# Altium PCB IMX8MMLPD4-CPU2_FULLY_PREPLACED_FANOUT.PcbDoc (part 1 of 3)
Units mil, origin at the board's own origin, x right, y up, seen from the top; angles counter-clockwise.
Board outline 2729.93 x 2000.03 mil, 8 copper layers (L1_PS, L2_GND_1, L3_IN1, L4_GND_2, L5_PWR_1, L6_PWR_2, L7_GND_3, L8_SS), stack 46.1 mil thick; 228 components, 321 nets, 1593 pads, 372 vias.
Unrouted connection lines stored in the file: 857.
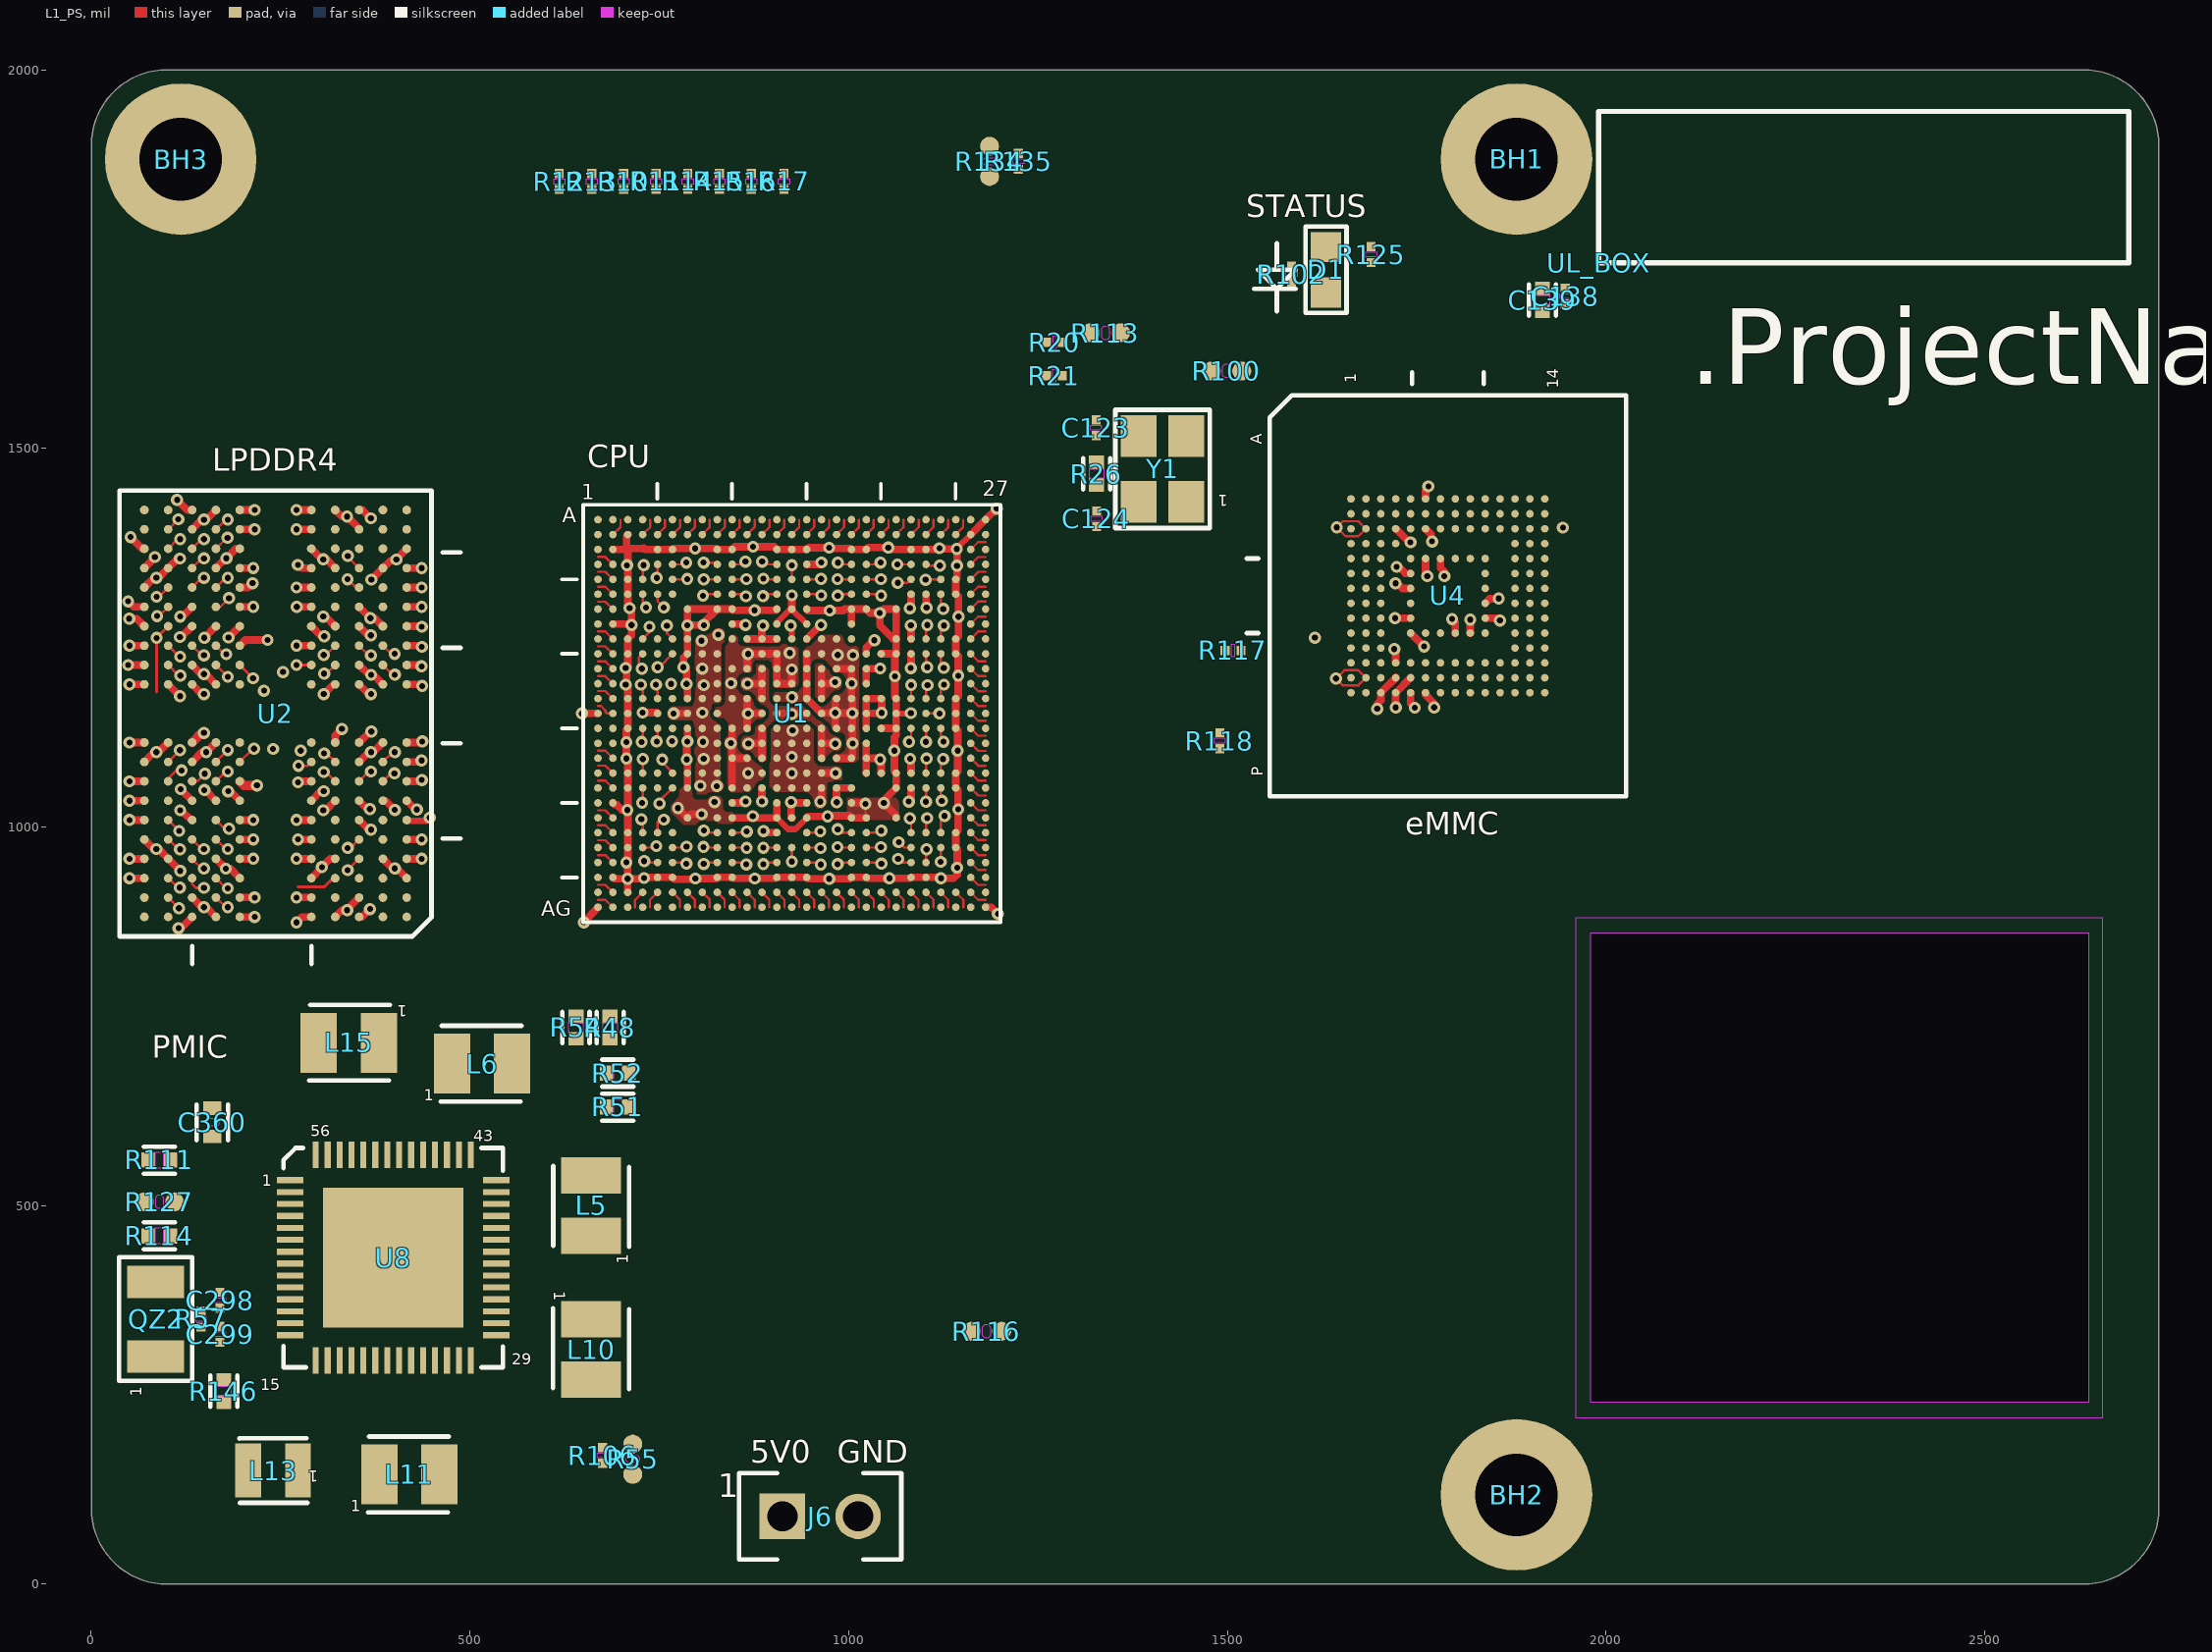
[diagram p0: L1_PS view]
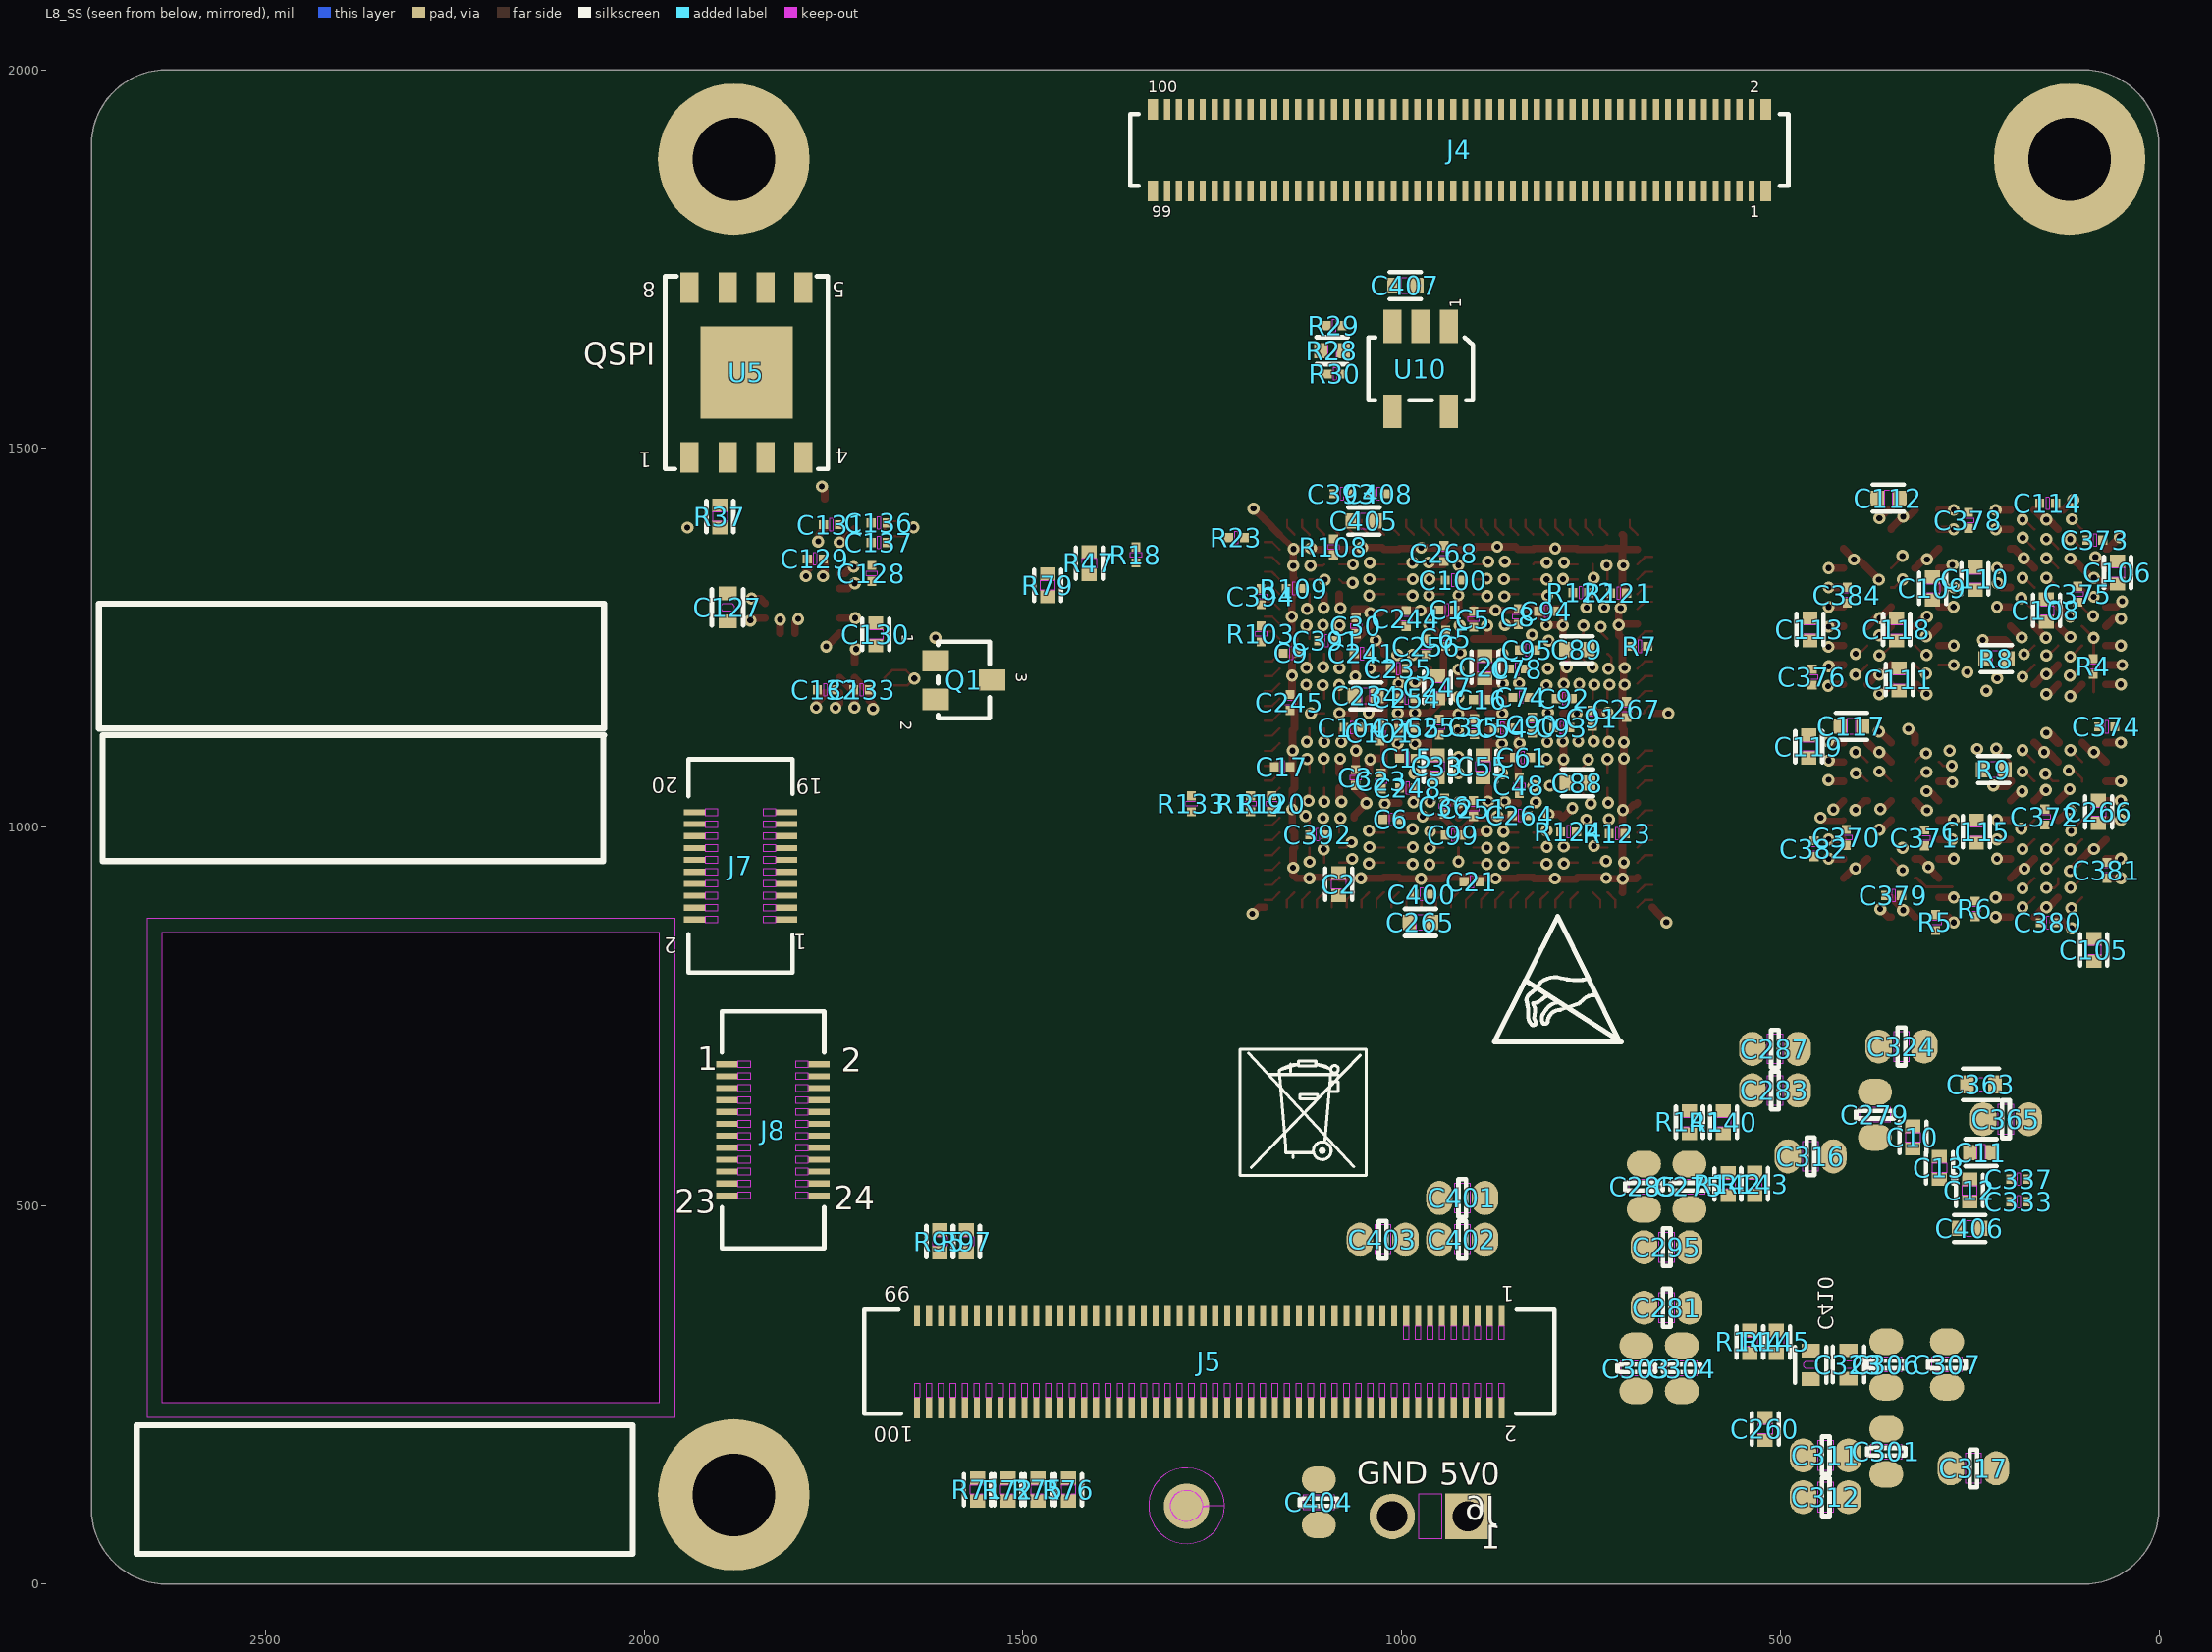
[diagram p1: L8_SS view, seen from below]
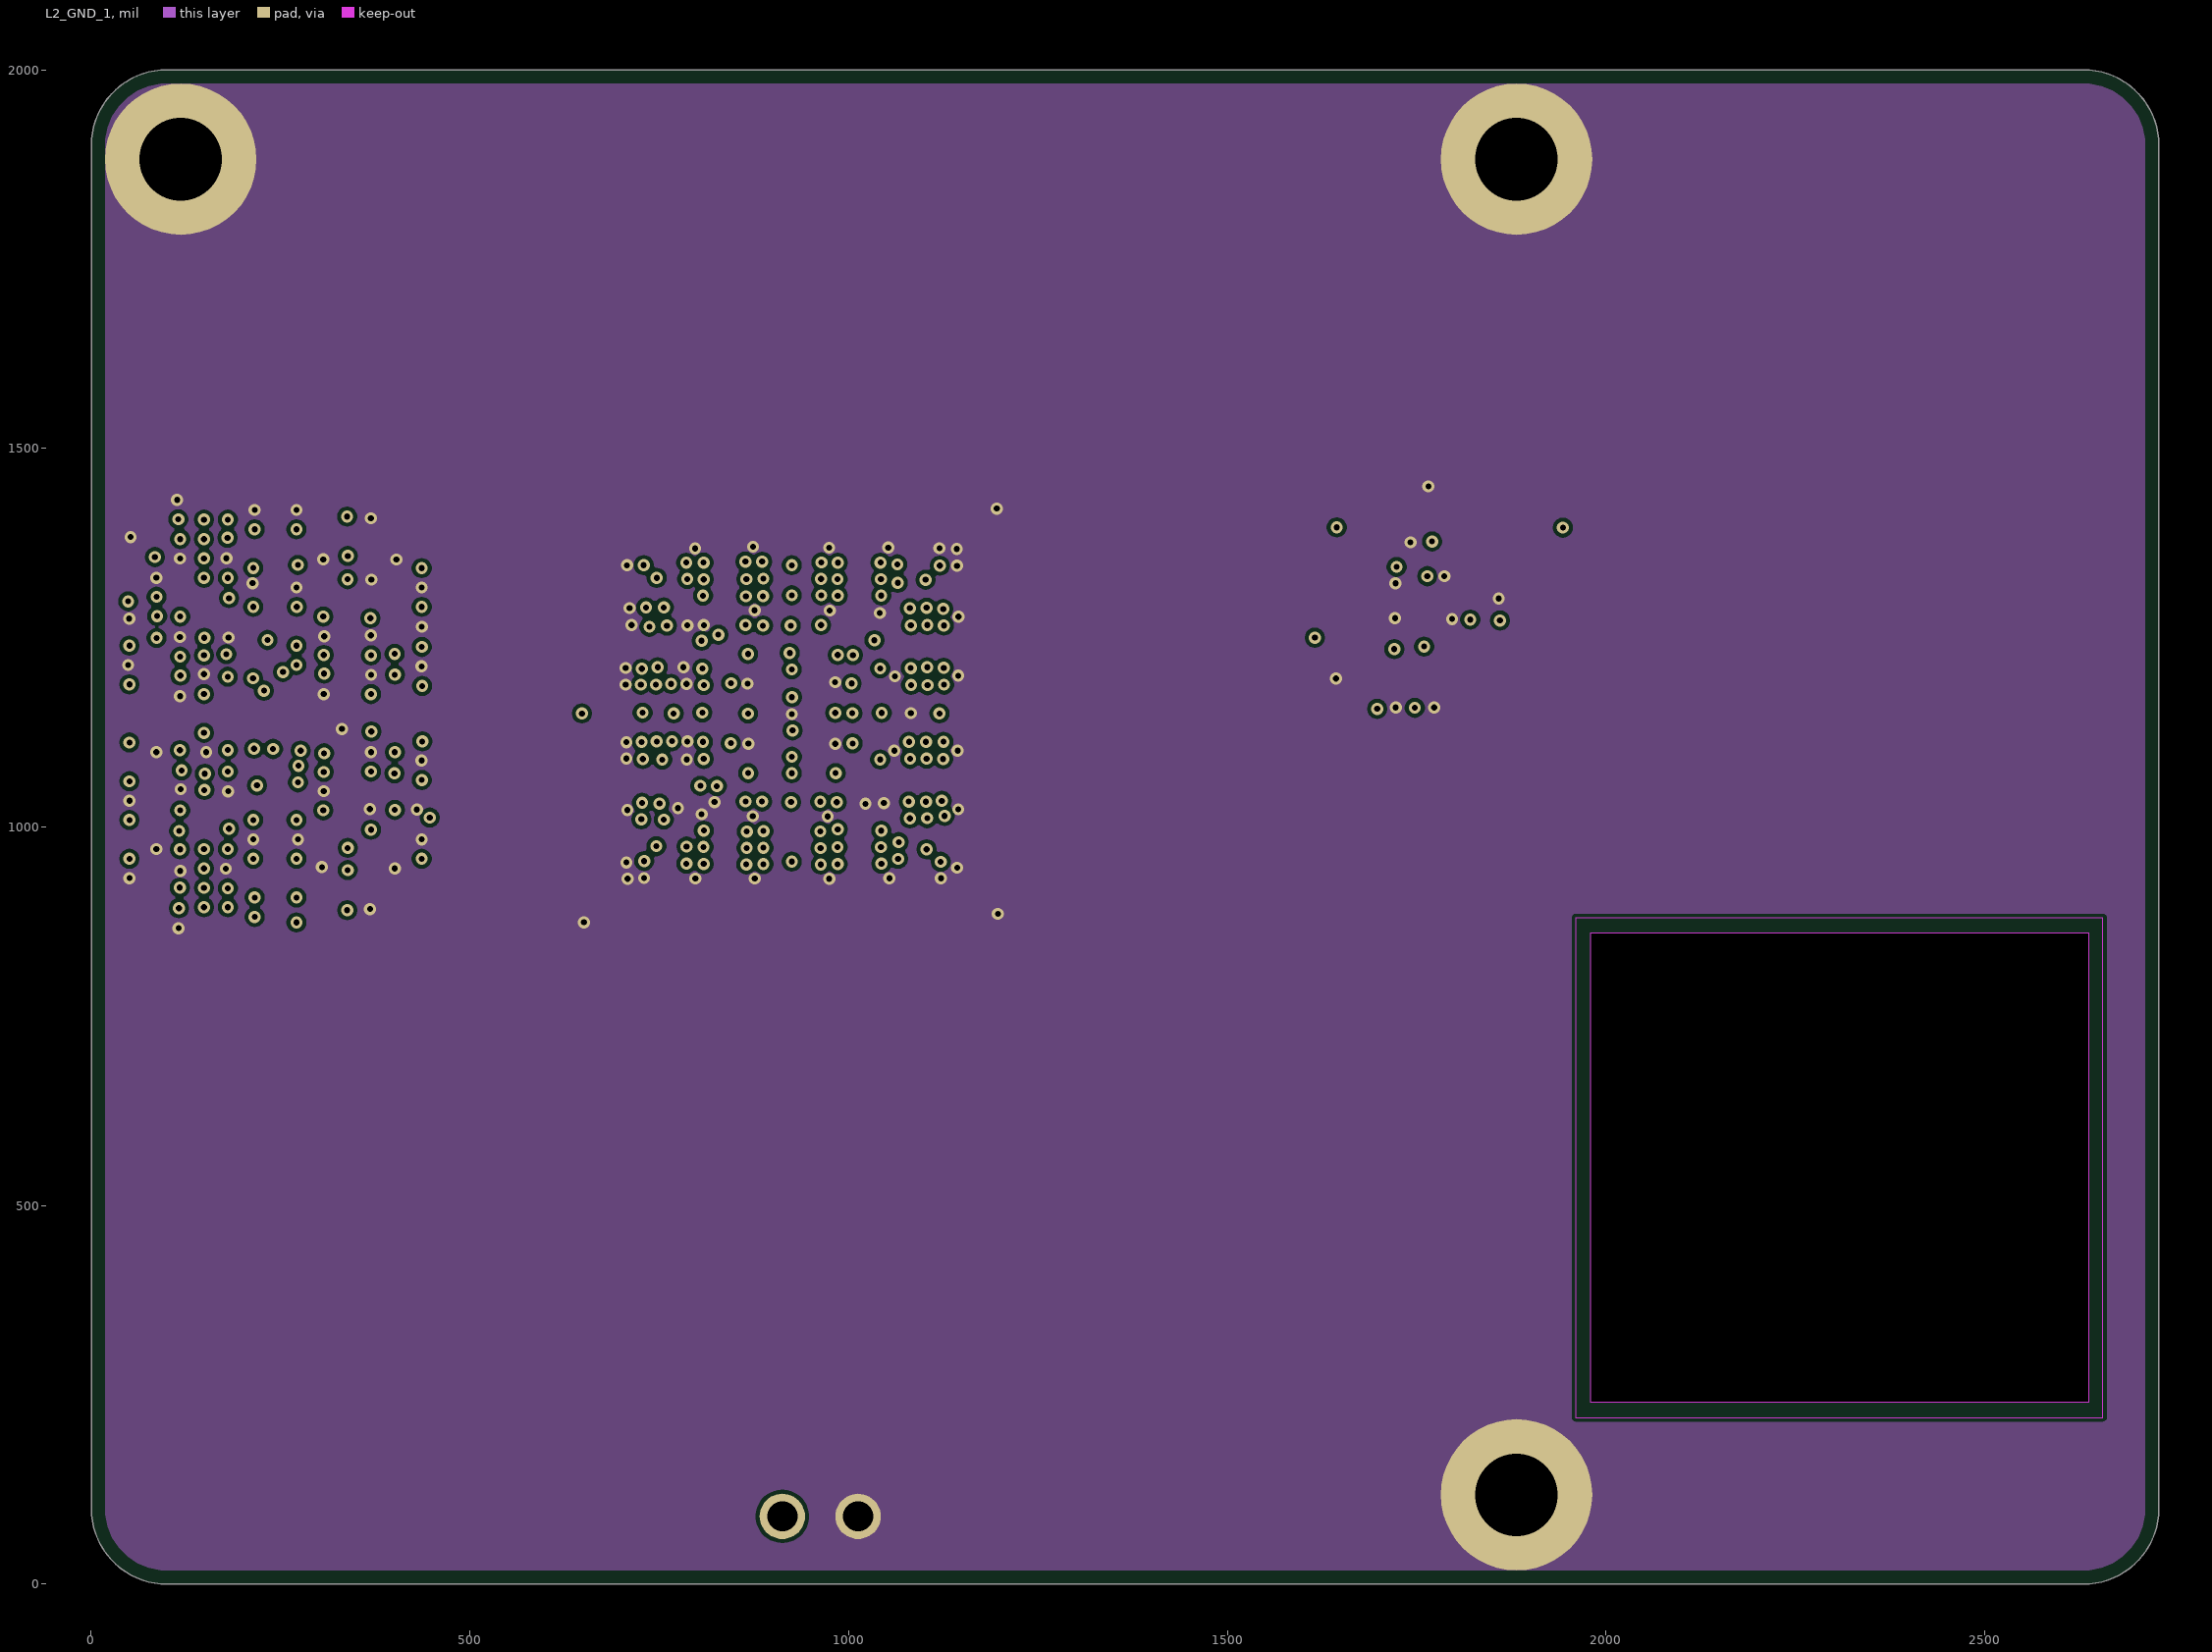
[diagram p2: L2_GND_1]
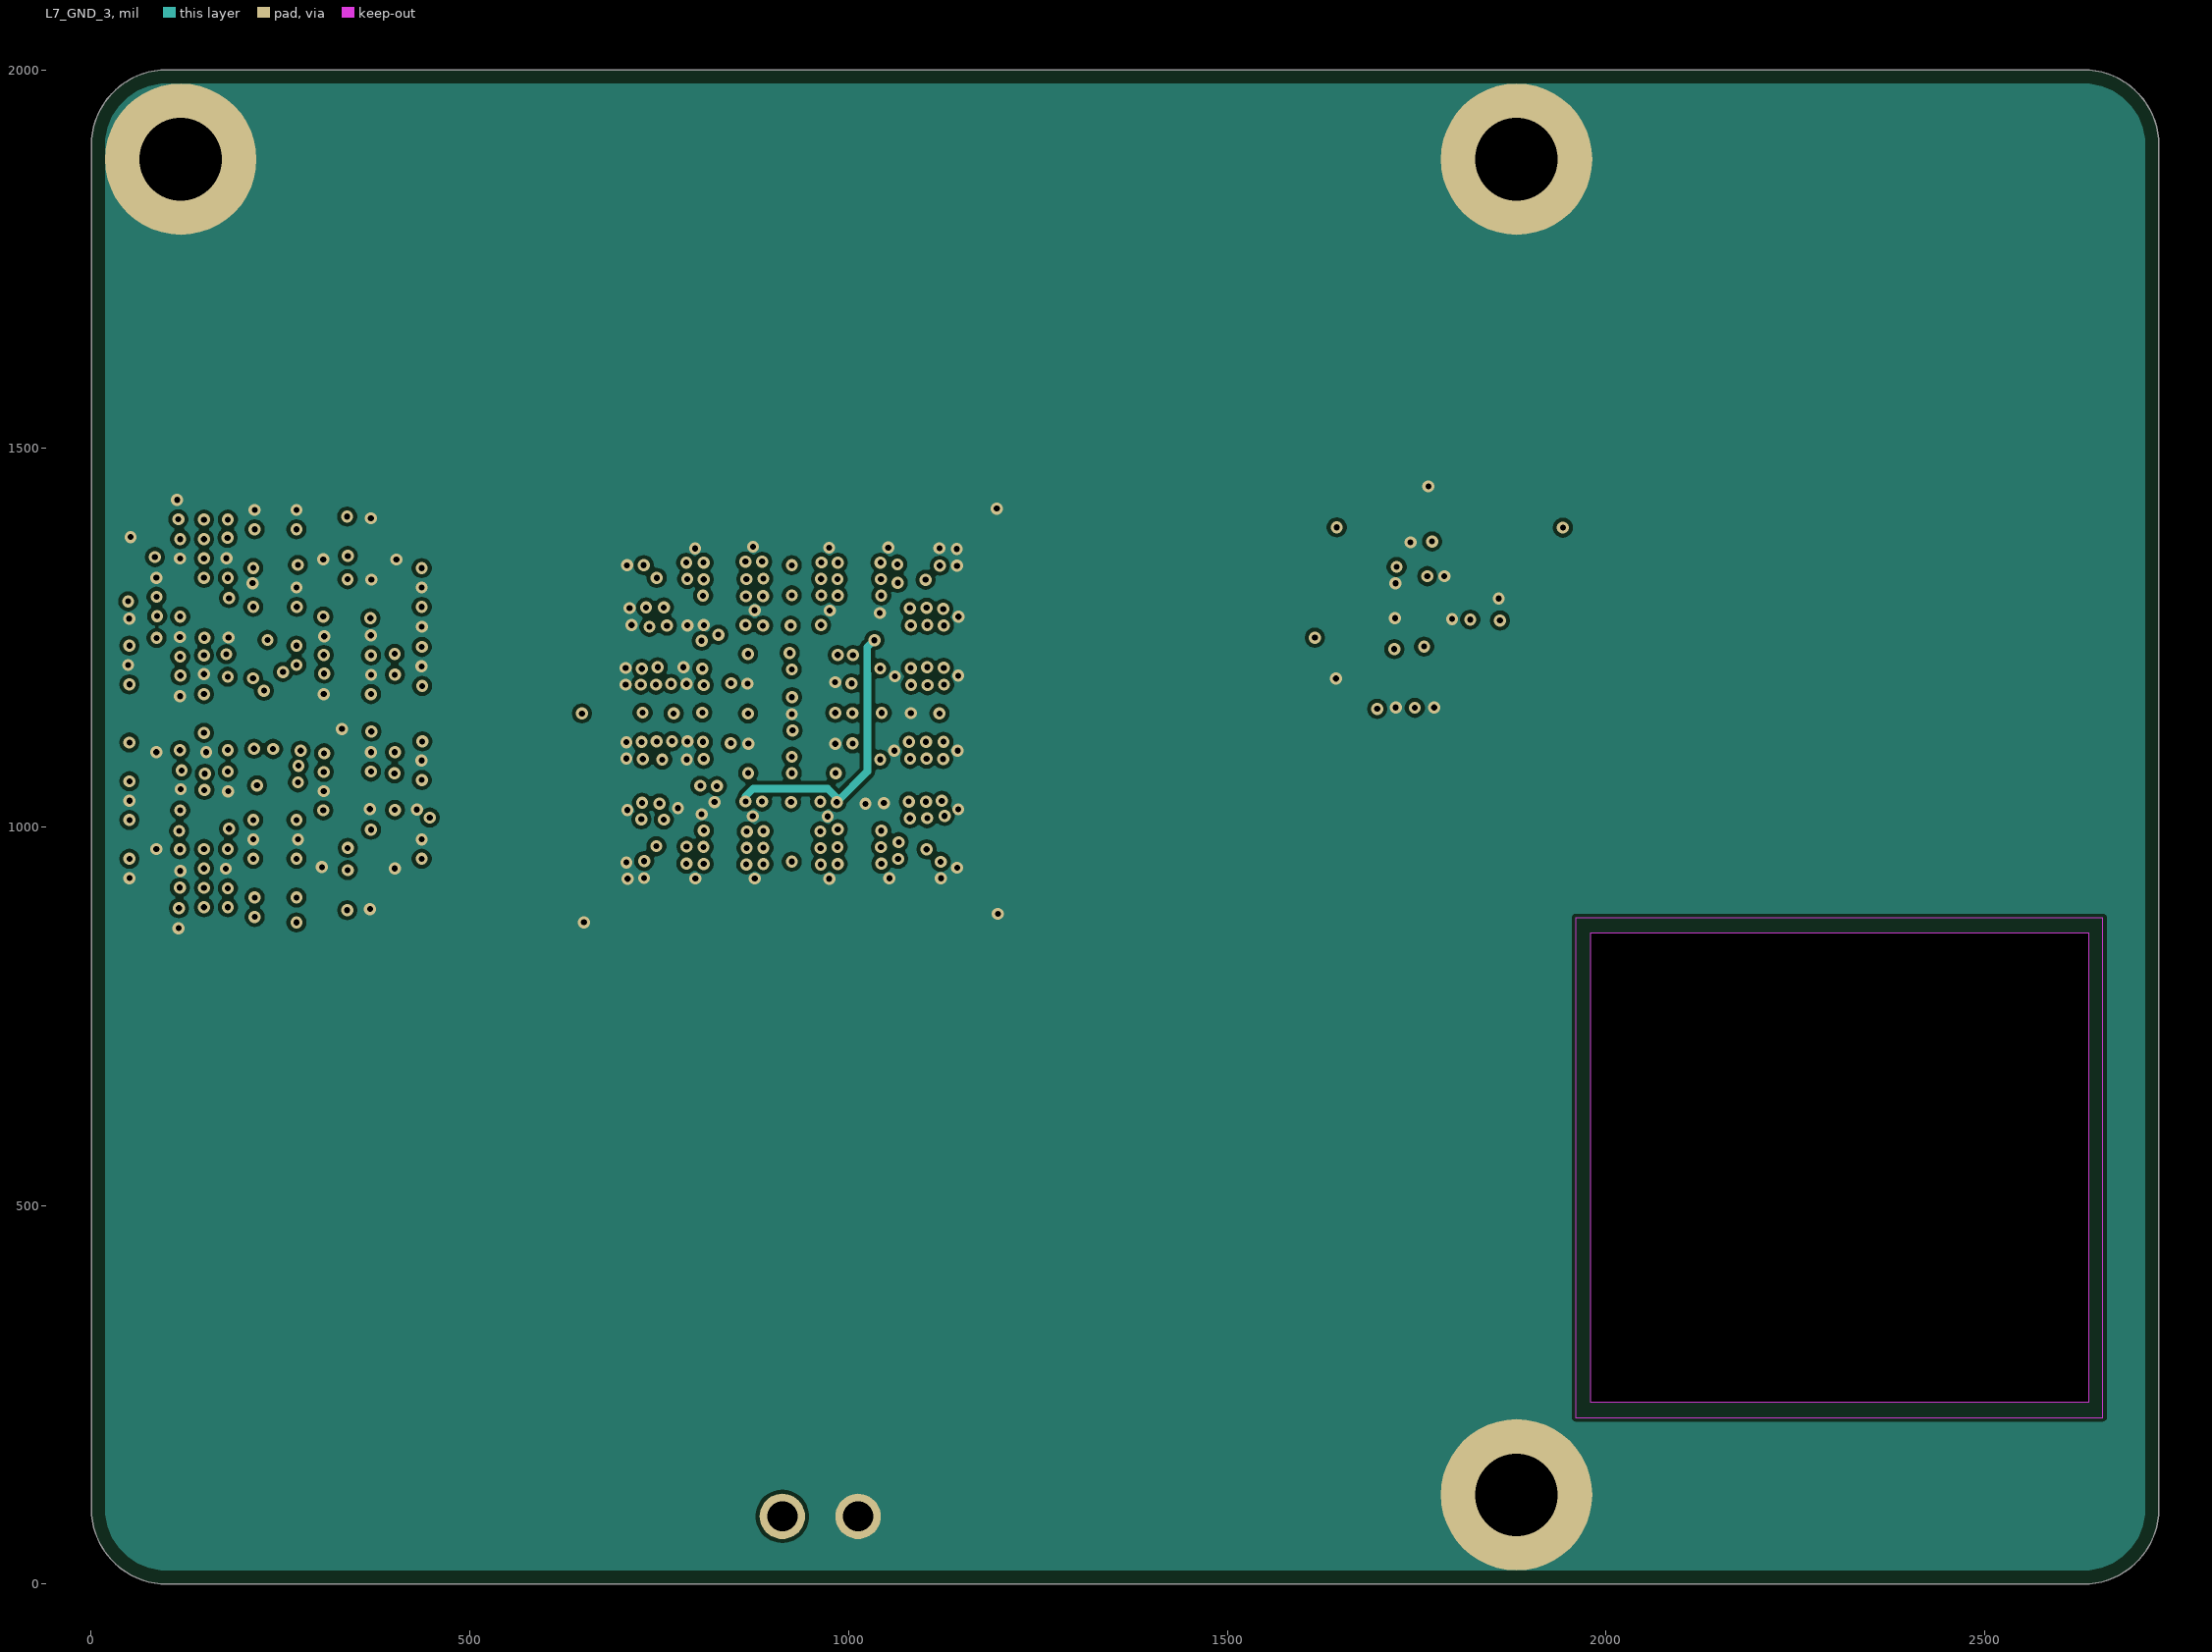
[diagram p3: L7_GND_3]

## Layer stack, top to bottom
Top Solder: solder mask 0.4, Solder Resist, Dk 3.5
L1_PS: signal copper 1.7
Dielectric 1: prepreg 2.77, TU768, Dk 3.9
L2_GND_1: signal copper 1.2
Dielectric2: core 3.94, TU768, Dk 4.25
L3_IN1: signal copper 1.2
Dielectric3: prepreg 5.04, TU768, Dk 3.9
L4_GND_2: signal copper 1.2
Dielectric4: core 12, TU768, Dk 4.25
L5_PWR_1: signal copper 1.2
Dielectric 5: prepreg 5.04, TU768, Dk 3.9
L6_PWR_2: signal copper 1.2
Dielectric 6: core 3.94, TU768, Dk 4.25
L7_GND_3: signal copper 1.2
Dielectric 7: prepreg 2.77, TU768, Dk 3.9
L8_SS: signal copper 1.7
Board Layer Stack Bottom Solder: solder mask 0.4, Solder Resist, Dk 3.5

## Board outline
1799.96,0.03 100.07,0.03 cw(c100.07,100.03) 0.07,100.03 0.07,1900.03 cw(c100.07,1900.03) 100.07,2000.03 1900,2000.03 2600,2000.03 2630,2000.03 cw(c2630,1900.03) 2730,1900.03 2730,100 cw(c2630,100) 2630,0 2600,0 1800.03,0 ccw(c1760.61,-91.89)
cut-out: 1980,240 1980,860 2636.98,860 2636.98,240

## Design rules (kind name [scope] priority, off if disabled: settings)
BoardOutlineClearance [All] p1: gap=10 ignorepadtopadclearanceinfootprint=FALSE except(0: Arc-SplitContinuation Track-SplitContinuation SMDPad-SplitContinuation THPad-SplitContinuation Via-SplitContinuation Fill-SplitContinuation Poly-SplitContinuation Region-SplitContinuation Text-SplitContinuation; 18: Poly-OutlineEdge)
Clearance Fanout_Top [WithinRoom('Page05 LPDDR4')] p1: gap=3 ignorepadtopadclearanceinfootprint=FALSE except(4: SMDPad-Fill SMDPad-Poly SMDPad-Region THPad-Fill THPad-Poly THPad-Region Via-Fill Via-Poly Via-Region Fill-Fill Fill-Poly Fill-Region Poly-Poly Poly-Region Region-Region)
Clearance [All] p2: gap=3 ignorepadtopadclearanceinfootprint=FALSE except(5: Arc-Fill Arc-Poly Arc-Region Track-Fill Track-Poly Track-Region SMDPad-Fill SMDPad-Poly SMDPad-Region THPad-Fill THPad-Poly THPad-Region Via-Fill Via-Poly Via-Region Fill-Fill Fill-Poly Fill-Region Poly-Poly Poly-Region Region-Region)
DiffPairsRouting 85OHM_BGA [WithinRoom('Page05 LPDDR4') and (InDifferentialPairClass('PCIE') or InDifferentialPairClass('DDR_CK_DQS'))] p1: maxlimit=10 minlimit=3 mostfreqgap=10 toplayer_maxgap=3 toplayer_prefgap=3 toplayer_minwidth=3 toplayer_maxwidth=3 toplayer_prefwidth=3 midlayer1_minwidth=15 midlayer1_maxwidth=15 midlayer1_prefwidth=15 midlayer2_minwidth=15 midlayer2_maxwidth=15 midlayer2_prefwidth=15 midlayer3_minwidth=15 midlayer3_maxwidth=15 midlayer3_prefwidth=15 midlayer4_minwidth=15 midlayer4_maxwidth=15 midlayer4_prefwidth=15 midlayer5_minwidth=15 midlayer5_maxwidth=15 midlayer5_prefwidth=15 midlayer6_minwidth=15 midlayer6_maxwidth=15 midlayer6_prefwidth=15 bottomlayer_maxgap=3 bottomlayer_prefgap=3 bottomlayer_minwidth=3 bottomlayer_maxwidth=3 bottomlayer_prefwidth=3 impedanceprofiledriven=TRUE impedanceprofileid={D168FA85-2EEC-4EE3-AF9D-CB938A88ED88} maxuncoupledlength=100
DiffPairsRouting 90OHM_BGA [WithinRoom('Page05 LPDDR4') and InDifferentialPairClass('USB')] p2: maxlimit=10 minlimit=3.7 mostfreqgap=10 toplayer_maxgap=3.7 toplayer_prefgap=3.7 toplayer_minwidth=3 toplayer_maxwidth=3 toplayer_prefwidth=3 midlayer1_minwidth=15 midlayer1_maxwidth=15 midlayer1_prefwidth=15 midlayer2_minwidth=15 midlayer2_maxwidth=15 midlayer2_prefwidth=15 midlayer3_minwidth=15 midlayer3_maxwidth=15 midlayer3_prefwidth=15 midlayer4_minwidth=15 midlayer4_maxwidth=15 midlayer4_prefwidth=15 midlayer5_minwidth=15 midlayer5_maxwidth=15 midlayer5_prefwidth=15 midlayer6_minwidth=15 midlayer6_maxwidth=15 midlayer6_prefwidth=15 bottomlayer_maxgap=3.7 bottomlayer_prefgap=3.7 bottomlayer_minwidth=3 bottomlayer_maxwidth=3 bottomlayer_prefwidth=3 impedanceprofiledriven=TRUE impedanceprofileid={6DEB45DD-4A17-414F-8A2A-BD264922939F} maxuncoupledlength=100
DiffPairsRouting 85OHM_PHY [InDifferentialPairClass('DDR_CK_DQS') or InDifferentialPairClass('PCIE')] p3: maxlimit=4.8 minlimit=4.8 mostfreqgap=4.8 toplayer_minwidth=4.2 toplayer_maxwidth=4.2 toplayer_prefwidth=4.2 midlayer1_minwidth=15 midlayer1_maxwidth=15 midlayer1_prefwidth=15 midlayer2_minwidth=15 midlayer2_maxwidth=15 midlayer2_prefwidth=15 midlayer3_minwidth=15 midlayer3_maxwidth=15 midlayer3_prefwidth=15 midlayer4_minwidth=15 midlayer4_maxwidth=15 midlayer4_prefwidth=15 midlayer5_minwidth=15 midlayer5_maxwidth=15 midlayer5_prefwidth=15 midlayer6_minwidth=15 midlayer6_maxwidth=15 midlayer6_prefwidth=15 bottomlayer_minwidth=4.2 bottomlayer_maxwidth=4.2 bottomlayer_prefwidth=4.2 impedanceprofiledriven=TRUE impedanceprofileid={6907453C-A626-405D-8703-9336A532926F} maxuncoupledlength=100
DiffPairsRouting 90OHM_USB [InDifferentialPairClass('USB')] p4: maxlimit=4.9 minlimit=4.9 mostfreqgap=4.9 toplayer_minwidth=3.6 toplayer_maxwidth=3.6 toplayer_prefwidth=3.6 midlayer1_minwidth=15 midlayer1_maxwidth=15 midlayer1_prefwidth=15 midlayer2_minwidth=15 midlayer2_maxwidth=15 midlayer2_prefwidth=15 midlayer3_minwidth=15 midlayer3_maxwidth=15 midlayer3_prefwidth=15 midlayer4_minwidth=15 midlayer4_maxwidth=15 midlayer4_prefwidth=15 midlayer5_minwidth=15 midlayer5_maxwidth=15 midlayer5_prefwidth=15 midlayer6_minwidth=15 midlayer6_maxwidth=15 midlayer6_prefwidth=15 bottomlayer_minwidth=3.6 bottomlayer_maxwidth=3.6 bottomlayer_prefwidth=3.6 impedanceprofiledriven=TRUE impedanceprofileid={597AA8FC-5D8D-40BE-9CD2-4FFC23E6EB33} maxuncoupledlength=100
DiffPairsRouting 100OHM_MIPI [WithinRoom('Page05 LPDDR4') and  (InDifferentialPairClass('CSI') or InDifferentialPairClass('DSI'))] p5: maxlimit=10 minlimit=6 mostfreqgap=10 toplayer_maxgap=6 toplayer_prefgap=6 toplayer_minwidth=3 toplayer_maxwidth=3 toplayer_prefwidth=3 midlayer1_minwidth=15 midlayer1_maxwidth=15 midlayer1_prefwidth=15 midlayer2_minwidth=15 midlayer2_maxwidth=15 midlayer2_prefwidth=15 midlayer3_minwidth=15 midlayer3_maxwidth=15 midlayer3_prefwidth=15 midlayer4_minwidth=15 midlayer4_maxwidth=15 midlayer4_prefwidth=15 midlayer5_minwidth=15 midlayer5_maxwidth=15 midlayer5_prefwidth=15 midlayer6_minwidth=15 midlayer6_maxwidth=15 midlayer6_prefwidth=15 bottomlayer_maxgap=6 bottomlayer_prefgap=6 bottomlayer_minwidth=3 bottomlayer_maxwidth=3 bottomlayer_prefwidth=3 impedanceprofiledriven=TRUE impedanceprofileid={D29423FF-BA17-4326-BA4E-33D47D66EFA7} maxuncoupledlength=100
DiffPairsRouting [All] p6: maxlimit=10 minlimit=6 mostfreqgap=10 toplayer_maxgap=6 toplayer_prefgap=6 toplayer_minwidth=3 toplayer_maxwidth=3 toplayer_prefwidth=3 midlayer1_minwidth=15 midlayer1_maxwidth=15 midlayer1_prefwidth=15 midlayer2_minwidth=15 midlayer2_maxwidth=15 midlayer2_prefwidth=15 midlayer3_minwidth=15 midlayer3_maxwidth=15 midlayer3_prefwidth=15 midlayer4_minwidth=15 midlayer4_maxwidth=15 midlayer4_prefwidth=15 midlayer5_minwidth=15 midlayer5_maxwidth=15 midlayer5_prefwidth=15 midlayer6_minwidth=15 midlayer6_maxwidth=15 midlayer6_prefwidth=15 bottomlayer_maxgap=6 bottomlayer_prefgap=6 bottomlayer_minwidth=3 bottomlayer_maxwidth=3 bottomlayer_prefwidth=3 impedanceprofiledriven=TRUE impedanceprofileid={D29423FF-BA17-4326-BA4E-33D47D66EFA7} maxuncoupledlength=50
Length "Schematic Length Constraint_2" [InDifferentialPairClass('DDR_CK_DQS')] p1: maxlimit=100000 minlimit=0 usedelayunits=TRUE mindelay=0.000000 maxdelay=200.000000
MatchedLengths DRAMB_CA [InNetClass('DRAMB_CA')] p1: tolerance=1000 checknetsindiffpair=FALSE checkdiffpairvsdiffpair=TRUE checkxsignals=TRUE checkothers=TRUE usedelayunits=TRUE delaytolerance=25.000000
MatchedLengths DDR_PAIRS [InDifferentialPairClass('DDR_CK_DQS')] p2: tolerance=1000 checknetsindiffpair=TRUE checkdiffpairvsdiffpair=FALSE checkxsignals=FALSE checkothers=FALSE usedelayunits=TRUE delaytolerance=1.000000
MatchedLengths DDR_DQS_to_CLK [InDifferentialPairClass('DDR_CK_DQS')] p3: tolerance=1000 checknetsindiffpair=FALSE checkdiffpairvsdiffpair=TRUE checkxsignals=TRUE checkothers=TRUE usedelayunits=TRUE delaytolerance=85.000000
MatchedLengths DRAMA_CA [InNetClass('DRAMA_CA')] p4: tolerance=1000 checknetsindiffpair=FALSE checkdiffpairvsdiffpair=TRUE checkxsignals=TRUE checkothers=TRUE usedelayunits=TRUE delaytolerance=25.000000
MatchedLengths DDR_BYTE0 [InNetClass('DRAM_BYTE0')] p5: tolerance=1000 checknetsindiffpair=FALSE checkdiffpairvsdiffpair=TRUE checkxsignals=TRUE checkothers=TRUE usedelayunits=TRUE delaytolerance=10.000000
MatchedLengths DDR_BYTE1 [InNetClass('DRAM_BYTE1')] p6: tolerance=1000 checknetsindiffpair=FALSE checkdiffpairvsdiffpair=TRUE checkxsignals=TRUE checkothers=TRUE usedelayunits=TRUE delaytolerance=10.000000
MatchedLengths DDR_BYTE3 [InNetClass('DRAM_BYTE3')] p7: tolerance=1000 checknetsindiffpair=FALSE checkdiffpairvsdiffpair=TRUE checkxsignals=TRUE checkothers=TRUE usedelayunits=TRUE delaytolerance=10.000000
MatchedLengths DDR_BYTE2 [InNetClass('DRAM_BYTE2')] p8: tolerance=1000 checknetsindiffpair=FALSE checkdiffpairvsdiffpair=TRUE checkxsignals=TRUE checkothers=TRUE usedelayunits=TRUE delaytolerance=10.000000
MatchedLengths QSPI [InNetClass('QSPI')] p9: tolerance=200 checknetsindiffpair=FALSE checkdiffpairvsdiffpair=TRUE checkxsignals=TRUE checkothers=TRUE usedelayunits=TRUE delaytolerance=100.000000
MatchedLengths EMMC [InNetClass('EMMC_SD3')] p10: tolerance=200 checknetsindiffpair=FALSE checkdiffpairvsdiffpair=TRUE checkxsignals=TRUE checkothers=TRUE usedelayunits=TRUE delaytolerance=100.000000
PlaneConnect [All] p1: planeconnectstyle=Direct reliefexpansion=20 reliefentries=4 reliefconductorwidth=10 reliefairgap=10
PolygonConnect [All] p1: connectstyle=Direct reliefconductorwidth=10 reliefentries=4 polygonreliefangle="90 Angle" airgapwidth=10
RoomDefinition "07-FLASH QCMI SOM" [InComponentClass('07-FLASH QCMI SOM')] p1: confinementstyle=ConfineIn formatcopy=TRUE lockcomponents=FALSE outline 1461.65,1020.59 2041.65,1020.59 2041.65,1755.59 1461.65,1755.59
RoomDefinition "03-CPULPDDR4 QCMI SOM" [InComponentClass('03-CPULPDDR4 QCMI SOM')] p2: confinementstyle=ConfineIn formatcopy=TRUE lockcomponents=FALSE outline 20,15 1700,15 1700,1960 20,1960
RoomDefinition "09-PMIC QCMI SOM" [InComponentClass('09-PMIC QCMI SOM')] p3: confinementstyle=ConfineIn formatcopy=TRUE lockcomponents=FALSE outline 1370,910 2685,910 2685,1755 1370,1755
RoutingVias [All] p1: holewidth=8 width=16 viastyle="Through Hole" minholewidth=8 minwidth=16 maxholewidth=28 maxwidth=50
SolderMaskExpansion Vias [IsVia and Not IsTestpoint] p1: expansion=0 istentingtop=TRUE
SolderMaskExpansion [All] p2: expansion=0 istentingtop=FALSE
SupplyNets "Schematic Supply Nets_18" [InNet('VDD_DRAM&PU_0V9')] p1: voltage=900.0m
SupplyNets "Schematic Supply Nets_17" [InNet('VDD_ARM_0V9')] p2: voltage=900.0m
SupplyNets "Schematic Supply Nets_16" [InNet('VDD_PHY_0V9')] p3: voltage=900.0m
SupplyNets "Schematic Supply Nets_15" [InNet('VDD_SOC_0V8')] p4: voltage=800.0m
SupplyNets "Schematic Supply Nets_14" [InNet('VDD_SNVS_0V8')] p5: voltage=800.0m
SupplyNets "Schematic Supply Nets_13" [InNet('VSYS_5V')] p6: voltage=5.000
SupplyNets "Schematic Supply Nets_12" [InNet('SWOUT_3V3')] p7: voltage=3.300
SupplyNets "Schematic Supply Nets_11" [InNet('VDD_3V3')] p8: voltage=3.300
SupplyNets "Schematic Supply Nets_10" [InNet('NVCC_SD2')] p9: voltage=3.300
SupplyNets "Schematic Supply Nets_9" [InNet('USB1_VBUS')] p10: voltage=3.300
SupplyNets "Schematic Supply Nets_8" [InNet('NVCC_ENET')] p11: voltage=3.300
SupplyNets "Schematic Supply Nets_7" [InNet('USB2_VBUS')] p12: voltage=3.300
SupplyNets "Schematic Supply Nets_6" [InNet('NVCC_SNVS_1V8')] p13: voltage=1.800
SupplyNets "Schematic Supply Nets_5" [InNet('VDD_1V8')] p14: voltage=1.800
SupplyNets "Schematic Supply Nets_4" [InNet('WIFI_1V8')] p15: voltage=1.800
SupplyNets "Schematic Supply Nets_3" [InNet('VDDA_1V8')] p16: voltage=1.800
SupplyNets "Schematic Supply Nets_2" [InNet('VDD_PHY_1V2')] p17: voltage=1.200
SupplyNets "Schematic Supply Nets_1" [InNet('NVCC_DRAM_1V1')] p18: voltage=1.100
SupplyNets "Schematic Supply Nets" [InNet('GND')] p19: voltage=0.000
Width RF_ANTENNA [InNet('ANT_IN0')] p1: maxlimit=11 minlimit=4.1 preferedwidth=11
Width "50-OHM SE" [Not InNetClass('POWER')] p2: maxlimit=10 minlimit=3.2 preferedwidth=10 toplayer_minwidth=4.1 toplayer_maxwidth=4.1 toplayer_prefwidth=4.1 midlayer2_maxwidth=3.2 midlayer2_prefwidth=3.2 bottomlayer_minwidth=4.1 bottomlayer_maxwidth=4.1 bottomlayer_prefwidth=4.1 impedanceprofiledriven=TRUE impedanceprofileid={40B00FBC-BADE-427C-967F-C3A84EBA9211} minimp=50.000000 maximp=50.000000 favimp=50.000000
Width [All] p3: maxlimit=100 minlimit=3 preferedwidth=10
28 further rules are at their usual default settings.

## Classes and differential pairs
differential pair class USB: USB1 USB2
differential pair class DRAMB_DQS: DRAMB_SDQS0 DRAMB_SDQS1
differential pair class DRAMA_DQS: DRAMA_SDQS0 DRAMA_SDQS1
differential pair class PCIE: PCIE_CLK PCIE_RX PCIE_TX
differential pair class DSI: DSI_CK DSI_D0 DSI_D1 DSI_D2 DSI_D3
differential pair class DDR_CK_DQS: DRAMA_CK DRAMA_SDQS0 DRAMA_SDQS1 DRAMB_CK DRAMB_SDQS0 DRAMB_SDQS1
differential pair class CSI: CSI_CK CSI_D0 CSI_D1 CSI_D2 CSI_D3
net class UART: UART1_CTS UART1_RTS UART1_RXD UART1_TXD UART2_RXD UART2_TXD UART3_CTS UART3_RTS UART3_RXD UART3_TXD UART4_RXD UART4_TXD
net class SD2: SD2_CLK SD2_CMD SD2_DATA0 SD2_DATA1 SD2_DATA2 SD2_DATA3 SD2_nCD SD2_nRST SD2_WP
net class SD1: BT_WAKE_DEV BT_WAKE_HOST SD1_CLK SD1_CMD SD1_DATA0 SD1_DATA1 SD1_DATA2 SD1_DATA3 SD1_STROBE WL_REG_ON WL_WAKE_DEV WL_WAKE_HOST
net class QSPI: QSPIA_DATA0 QSPIA_DATA1 QSPIA_DATA2 QSPIA_DATA3 QSPIA_nSS0 QSPIA_SCLK
net class POWER: GND NVCC_DRAM_1V1 NVCC_ENET NVCC_SD2 NVCC_SNVS_1V8 SWOUT_3V3 USB1_VBUS USB2_VBUS VDD_1V8 VDD_3V3 VDD_ARM_0V9 VDD_DRAM&PU_0V9 VDD_PHY_0V9 VDD_PHY_1V2 VDD_SNVS_0V8 VDD_SOC_0V8 VDDA_1V8 VSYS_5V
net class NAND: QSPIA_DATA0 QSPIA_DATA1 QSPIA_DATA2 QSPIA_DATA3 QSPIA_nSS0 QSPIA_SCLK SD3_CLK SD3_CMD SD3_DATA0 SD3_DATA1 SD3_DATA2 SD3_DATA3 SD3_DATA4 SD3_DATA5 SD3_DATA6 SD3_DATA7 SD3_STROBE SYS_STATUS
net class I2C: I2C1_SCL I2C1_SDA I2C2_SCL I2C2_SDA I2C3_SCL I2C3_SDA I2C4_SCL I2C4_SDA
net class ETH: ENET_MDC ENET_MDIO ENET_RD0 ENET_RD1 ENET_RD2 ENET_RD3 ENET_RX_CTL ENET_RXC ENET_TD0 ENET_TD1 ENET_TD2 ENET_TD3 ENET_TX_CTL ENET_TXC
net class EMMC_SD3: SD3_CLK SD3_CMD SD3_DATA0 SD3_DATA1 SD3_DATA2 SD3_DATA3 SD3_DATA4 SD3_DATA5 SD3_DATA6 SD3_DATA7
net class DRAMB_CA: DRAMB_CA0 DRAMB_CA1 DRAMB_CA2 DRAMB_CA3 DRAMB_CA4 DRAMB_CA5 DRAMB_CK_C DRAMB_CK_T DRAMB_CKE0 DRAMB_CKE1 DRAMB_nCS0 DRAMB_nCS1
net class DRAMA_CA: DRAMA_CA0 DRAMA_CA1 DRAMA_CA2 DRAMA_CA3 DRAMA_CA4 DRAMA_CA5 DRAMA_CK_C DRAMA_CK_T DRAMA_CKE0 DRAMA_CKE1 DRAMA_nCS0 DRAMA_nCS1
net class DRAM_BYTE3: DRAMA_DATA0 DRAMA_DATA1 DRAMA_DATA2 DRAMA_DATA3 DRAMA_DATA4 DRAMA_DATA5 DRAMA_DATA6 DRAMA_DATA7 DRAMA_DMI0 DRAMA_SDQS0_C DRAMA_SDQS0_T
net class DRAM_BYTE2: DRAMA_DATA8 DRAMA_DATA9 DRAMA_DATA10 DRAMA_DATA11 DRAMA_DATA12 DRAMA_DATA13 DRAMA_DATA14 DRAMA_DATA15 DRAMA_DMI1 DRAMA_SDQS1_C DRAMA_SDQS1_T
net class DRAM_BYTE1: DRAMB_DATA8 DRAMB_DATA9 DRAMB_DATA10 DRAMB_DATA11 DRAMB_DATA12 DRAMB_DATA13 DRAMB_DATA14 DRAMB_DATA15 DRAMB_DMI1 DRAMB_SDQS1_C DRAMB_SDQS1_T
net class DRAM_BYTE0: DRAMB_DATA0 DRAMB_DATA1 DRAMB_DATA2 DRAMB_DATA3 DRAMB_DATA4 DRAMB_DATA5 DRAMB_DATA6 DRAMB_DATA7 DRAMB_DMI0 DRAMB_SDQS0_C DRAMB_SDQS0_T
component class "10-BBCON QCMI SOM": BH1 BH2 BH3 C2 C401 C402 C403 C404 J4 J5 J7 J8 R116
component class "09-PMIC QCMI SOM": C10 C11 C12 C13 C275 C279 C281 C283 C285 C287 C295 C298 C299 C301 C303 C304 C306 C307 C311 C312 C316 C317 C323 C324 C333 C337 C360 C363 C365 C406 C407 C408 C410 J6 L5 L6 L10 L11 L13 L15 QZ2 R48 R51 R52 R54 R55 R57 R106 R111 R114 R127 R140 R141 R142 R143 R144 R145 R146 U8 U10
component class "08-BOOTCFG QMCI SOM": R47 R71 R72 R75 R76 R79 R95 R97
component class "07-FLASH QCMI SOM": C127 C128 C129 C130 C131 C132 C133 C136 C137 C138 C139 R37 R117 R118 U4 U5
component class "06-CPUCTL QCMI SOM": C123 C124 R18 R20 R21 R23 R26 R100 R102 R103 R113 R134 R135 Y1
component class "05-CPUPHY QCMI SOM": C393 C394 R28 R29 R30 R108 R109
component class "04-CPUIO QCMI SOM": C245 D1 Q1 R10 R11 R12 R13 R14 R15 R16 R17 R119 R120 R125 R133
component class "03-CPULPDDR4 QCMI SOM": C105 C106 C108 C109 C110 C111 C112 C113 C114 C115 C117 C118 C119 C370 C371 C372 C373 C374 C375 C376 C378 C379 C380 C381 C382 C384 R4 R5 R6 R7 R8 R9 R121 R122 R123 R124 U1 U2
component class "02-CPUPWR QCMI SOM": C1 C3 C5 C6 C8 C9 C15 C16 C17 C20 C21 C23 C30 C33 C35 C36 C48 C54 C55 C61 C65 C74 C78 C88 C89 C90 C91 C92 C93 C94 C95 C99 C100 C101 C104 C234 C235 C241 C244 C247 C248 C251 C253 C254 C255 C256 C260 C264 C265 C266 C267 C268 C391 C392 C400 C405
differential pair USB2: +USB2_DP -USB2_DN
differential pair USB1: +USB1_DP -USB1_DN
differential pair PCIE_TX: +PCIE_TX_P -PCIE_TX_N
differential pair PCIE_RX: +PCIE_RX_P -PCIE_RX_N
differential pair PCIE_CLK: +PCIE_CLK_P -PCIE_CLK_N
differential pair DSI_D3: +DSI_D3_P -DSI_D3_N
differential pair DSI_D2: +DSI_D2_P -DSI_D2_N
differential pair DSI_D1: +DSI_D1_P -DSI_D1_N
differential pair DSI_D0: +DSI_D0_P -DSI_D0_N
differential pair DSI_CK: +DSI_CK_P -DSI_CK_N
differential pair CSI_D3: +CSI_D3_P -CSI_D3_N
differential pair CSI_D2: +CSI_D2_P -CSI_D2_N
differential pair CSI_D1: +CSI_D1_P -CSI_D1_N
differential pair CSI_D0: +CSI_D0_P -CSI_D0_N
differential pair CSI_CK: +CSI_CK_P -CSI_CK_N
differential pair DRAMB_SDQS1: +DRAMB_SDQS1_T -DRAMB_SDQS1_C
differential pair DRAMB_SDQS0: +DRAMB_SDQS0_T -DRAMB_SDQS0_C
differential pair DRAMB_CK: +DRAMB_CK_T -DRAMB_CK_C
differential pair DRAMA_SDQS1: +DRAMA_SDQS1_T -DRAMA_SDQS1_C
differential pair DRAMA_SDQS0: +DRAMA_SDQS0_T -DRAMA_SDQS0_C
differential pair DRAMA_CK: +DRAMA_CK_T -DRAMA_CK_C

## Components (designator, comment, footprint, x,y, rotation, side; value= is the part's Value field where it differs from the comment)
BH1 "MOUNTING HOLE" GNDPOINT256 1881.85,1881.82 r0 top
BH2 "MOUNTING HOLE" GNDPOINT256 1881.85,118.04 r0 top
BH3 "MOUNTING HOLE" GNDPOINT256 118.07,1881.82 r0 top
C1 "0.22UF" 0201_CC 940.29,1286.45 r0 bottom
C2 "2.2uF" 0402_CC 1083.09,924.5 r270 bottom
C3 "0.22UF" 0201_CC 1060.77,1065.24 r270 bottom
C5 "0.22UF" 0201_CC 905,1274.32 r90 bottom
C6 "0.22UF" 0201_CC 1014.29,1010.06 r0 bottom
C8 "0.22UF" 0201_CC 845.89,1277.9 r90 bottom
C9 "0.22UF" 0201_CC 1145.86,1229.43 r0 bottom
C10 "1.0UF" 0402_CC 325,590 r270 bottom
C11 "2.2uF" 0402_CC 235,570 r180 bottom
C12 "2.2uF" 0402_CC 250,520 r270 bottom
C13 "2.2uF" 0402_CC 290,550 r270 bottom
C15 "1uF" 0201_CC 992.36,1090.78 r180 bottom
C16 "1uF" 0201_CC 894.75,1168.18 r180 bottom
C17 "0.22UF" 0201_CC 1157.64,1079.31 r0 bottom
C20 "10uF" 0402_cc_nsp 890.07,1211.02 r270 bottom
C21 "0.22UF" 0201_CC 906.93,927.76 r180 bottom
C23 "0.22UF" 0201_CC 1027.15,1060.73 r270 bottom
C30 "0.22UF" 0201_CC 1060.23,1265.51 r90 bottom
C33 "10uF" 0402_cc_nsp 953.1,1079.94 r90 bottom
C35 "1uF" 0201_CC 903.85,1132.42 r90 bottom
C36 "1uF" 0201_CC 943.44,1027.66 r270 bottom
C48 "1uF" 0201_CC 844.62,1054.52 r270 bottom
C54 "1uF" 0201_CC 866.82,1130.41 r180 bottom
C55 "10uF" 0402_cc_nsp 892.54,1079.93 r90 bottom
C61 "1uF" 0201_CC 840.45,1091.56 r0 bottom
C65 "1uF" 0201_CC 941.7,1249.11 r90 bottom
C74 "1uF" 0201_CC 842.41,1171.19 r0 bottom
C78 "1uF" 0201_CC 847.27,1208.61 r0 bottom
C88 "10uF" 0402_cc_nsp 767.58,1058.1 r180 bottom
C89 "10uF" 0402_cc_nsp 768.25,1234 r180 bottom
C90 "1uF" 0201_CC 827.25,1134.41 r270 bottom
C91 "1uF" 0201_CC 748.42,1143.48 r90 bottom
C92 "1uF" 0201_CC 785.15,1169.51 r180 bottom
C93 "1uF" 0201_CC 788.71,1131.11 r180 bottom
C94 "1uF" 0201_CC 808.89,1284.9 r180 bottom
C95 "1uF" 0201_CC 833.89,1233.61 r0 bottom
C99 "0.22UF" 0201_CC 931.79,989.41 r0 bottom
C100 "0.22UF" 0201_CC 931.89,1325.9 r0 bottom
C101 "0.22UF" 0201_CC 1028.89,1123.9 r270 bottom
C104 "0.22UF" 0201_CC 1065.54,1131.45 r0 bottom
C105 "10uF" 0402_cc_nsp 86.19,837.6 r90 bottom
C106 "10uF" 0402_cc_nsp 54.89,1335.9 r90 bottom
C108 "10uF" 0402_cc_nsp 148.58,1285.83 r90 bottom
C109 "10uF" 0402_cc_nsp 298.93,1314.99 r90 bottom
C110 "10uF" 0402_cc_nsp 242.89,1327.9 r270 bottom
C111 "10uF" 0402_cc_nsp 343,1194.65 r90 bottom
C112 "10uF" 0402_cc_nsp 357.23,1434.05 r0 bottom
C113 "10uF" 0402_cc_nsp 460.89,1260.9 r90 bottom
C114 "0.22uF" 0201_CC 147.02,1427.27 r180 bottom
C115 "10uF" 0402_cc_nsp 241.39,993.9 r270 bottom
C117 "10uF" 0402_cc_nsp 405.89,1132.9 r0 bottom
C118 "10uF" 0402_cc_nsp 346.54,1260.68 r270 bottom
C119 "10uF" 0402_cc_nsp 462.5,1106.21 r270 bottom
C123 "12pF" 0201_CC 1326.68,1527.24 r90 top
C124 "12pF" 0201_CC 1327.3,1407.02 r270 top
C127 "4.7uF" cc0402_tol0p15 1890,1290 r90 bottom
C128 "0.22UF" 0201_CC 1699.59,1334.89 r270 bottom
C129 "0.22UF" 0201_CC 1774.16,1354.01 r0 bottom
C130 "10uF" 0402_cc_nsp 1694.3,1254.19 r90 bottom
C131 "0.22UF" 0201_CC 1752.7,1399.15 r180 bottom
C132 "0.22UF" 0201_CC 1761,1181 r0 bottom
C133 "0.22UF" 0201_CC 1713,1181 r0 bottom
C136 "0.22UF" 0201_CC 1689.89,1401.66 r0 bottom
C137 "1uF" 0201_CC 1689.89,1375.66 r0 bottom
C138 "0.22UF" 0201_CC 1946,1701 r270 top
C139 "10uF" 0402_cc_nsp 1916,1696 r270 top
C234 "4.7uF" 0402_cc_nsp 1047.43,1173.08 r180 bottom
C235 "0.22UF" 0201_CC 1004.14,1209.18 r180 bottom
C241 "0.22UF" 0201_CC 1052.17,1228.77 r0 bottom
C244 "0.22UF" 0201_CC 993.88,1275.23 r90 bottom
C245 "18pF" 0201_CC 1147.38,1164.41 r90 bottom
C247 "10uF" 0402_cc_nsp 952.67,1184.34 r90 bottom
C248 "1uF" 0201_CC 992.23,1051.61 r0 bottom
C251 "1uF" 0201_CC 905.13,1024.37 r270 bottom
C253 "1uF" 0201_CC 950.36,1132.14 r90 bottom
C254 "1uF" 0201_CC 993.18,1170.05 r180 bottom
C255 "1uF" 0201_CC 993.2,1130.38 r180 bottom
C256 "1uF" 0201_CC 967.36,1237.84 r270 bottom
C260 "4.7uF" 0402_cc_nsp 520,205 r90 bottom
C264 "0.22UF" 0201_CC 843.42,1015.27 r180 bottom
C265 "10uF" 0402_cc_nsp 975.23,873.86 r0 bottom
C266 "10uF" 0402_cc_nsp 80,1020 r90 bottom
C267 "1uF" 0201_CC 703,1155 r90 bottom
C268 "2200PF" 0201_CC 944.2,1361.08 r90 bottom
C275 "22uF" CC0603_OV 620,525 r270 bottom
C279 "10uF" CC0603_OV 375,620 r270 bottom
C281 "10uF" CC0603_OV 650,365 r180 bottom
C283 "22uF" CC0603_OV 507,652 r180 bottom
C285 "22uF" CC0603_OV 680,525 r270 bottom
C287 "22uF" CC0603_OV 507,707 r180 bottom
C295 "10uF" CC0603_OV 650,445 r180 bottom
C298 "18pF" 0201_CC 170,375 r90 top
C299 "18pF" 0201_CC 170,330 r270 top
C301 "10uF" CC0603_OV 360,175 r90 bottom
C303 "22uF" CC0603_OV 690,285 r90 bottom
C304 "22uF" CC0603_OV 630,285 r90 bottom
C306 "10uF" CC0603_OV 360,290 r270 bottom
C307 "10uF" CC0603_OV 280,290 r270 bottom
C311 "22uF" CC0603_OV 440,170 r180 bottom
C312 "22uF" CC0603_OV 440,115 r180 bottom
C316 "10uF" CC0603_OV 460,565 r180 bottom
C317 "22uF" CC0603_OV 245,153 r0 bottom
C323 "4.7uF" cc0402_tol0p15 410,290 r270 bottom
C324 "22uF" CC0603_OV 340,710 r0 bottom
C333 "1uF" 0201_CC 185,505 r180 bottom
C337 "1uF" 0201_CC 185,535 r180 bottom
C360 "4.7uF" cc0402_tol0p15 160,610 r90 top
C363 "4.7uF" cc0402_tol0p15 235,660 r180 bottom
C365 "1.0UF" CC0603_OV 202,614 r180 bottom
C370 "0.22uF" 0201_CC 412.78,986.24 r270 bottom
C371 "0.22uF" 0201_CC 309.5,985.63 r270 bottom
C372 "0.22uF" 0201_CC 150.6,1013.02 r270 bottom
C373 "0.22uF" 0201_CC 84.89,1378.9 r0 bottom
C374 "0.22uF" 0201_CC 68.96,1132.26 r0 bottom
C375 "0.22uF" 0201_CC 107.2,1307.29 r90 bottom
C376 "0.22uF" 0201_CC 457.89,1197.9 r90 bottom
C378 "0.22uF" 0201_CC 251.62,1404.97 r90 bottom
C379 "0.22uF" 0201_CC 350.57,909.56 r0 bottom
C380 "0.22uF" 0201_CC 146.19,873.63 r180 bottom
C381 "0.22uF" 0201_CC 68.89,942.9 r270 bottom
C382 "0.22uF" 0201_CC 455.49,971.18 r90 bottom
C384 "0.22uF" 0201_CC 411.64,1306.23 r90 bottom
C391 "1uF" 0201_CC 1098.94,1246.02 r0 bottom
C392 "0.22UF" 0201_CC 1110.69,989.7 r0 bottom
C393 "0.22UF" 0201_CC 1079,1440 r180 bottom
C394 "0.22UF" 0201_CC 1185.53,1304.18 r270 bottom
C400 "0.22UF" 0201_CC 973.25,911.1 r0 bottom
C401 "10uF" CC0603_OV 920,510 r180 bottom
C402 "10uF" CC0603_OV 920,455 r180 bottom
C403 "22uF" CC0603_OV 1025,455 r180 bottom
C404 "22uF" CC0603_OV 1109.35,108.17 r270 bottom
C405 "2.2uF" 0402_CC 1050,1404 r0 bottom
C406 "1.0UF" 0402_CC 250,470 r0 bottom
C407 "1.0UF" 0402_CC 995,1715 r0 bottom
C408 "1uF" 0201_CC 1030,1440 r0 bottom
C410 "4.7uF" cc0402_tol0p15 460,289.7 r90 bottom
D1 "LED GREEN" LED_0603 1630.29,1735.74 r270 top
J4 "DF40C-100DP-0.4V(51)" con100_0p4_21p7x2p05_sm 923.89,1893.9 r180 bottom
J5 "DF40C-100DS-0.4V(51)" con100_0p4_22p8x3p1_sm 1253.89,293.9 r0 bottom
J6 "HDR 1X2 TH" HDR_1X2 912.42,89.57 r90 top
J7 "DF40C-20DS-0.4V(51)" con20_0p4_6p8x3p1_sm 1872.86,948.57 r90 bottom
J8 "CON 2X12" con24_0p4_7p6x3p08_sm 1830,600 r270 bottom
L5 "0.47uH" ind_sph2520 660,500 r90 top
L6 "0.47uH" ind_sph2520 515.97,687.43 r0 top
L10 "0.47uH" ind_sph2520 660,310 r270 top
L11 "1uH" ind_sph2520 420,145 r0 top
L13 "0.47uH" IND_2016A 240,150 r180 top
L15 "0.47uH" ind_sph2520 340,715 r180 top
Q1 "NX3008NBKW,115" sc70_3 1578,1194 r270 bottom
QZ2 "32.768KHZ" XTAL2-3P2X1P5-SM 85,350 r90 top
R4 "10K" 0201_CC 86.89,1211.9 r90 bottom
R5 "240 OHM" 0201_CC 294.98,873.65 r270 bottom
R6 "240 OHM" 0201_CC 242.62,891.73 r270 bottom
R7 "240 OHM" 0201_CC 685.44,1238.46 r180 bottom
R8 "150" 0402_CC 214.66,1222.19 r180 bottom
R9 "150" 0402_CC 218.32,1075.75 r180 bottom
R10 "4.7K" 0201_CC 702.89,1852.31 r90 top
R11 "4.7K" 0201_CC 745.85,1852.31 r90 top
R12 "4.7K" 0201_CC 617.85,1852.31 r90 top
R13 "4.7K" 0201_CC 660.85,1852.31 r90 top
R14 "4.7K" 0201_CC 787.61,1852.31 r90 top
R15 "4.7K" 0201_CC 829.18,1852.31 r90 top
R16 "4.7K" 0201_CC 871.59,1852.31 r90 top
R17 "4.7K" 0201_CC 914.6,1852.31 r90 top
R18 "10K" 0201_CC 1350.79,1359.2 r90 bottom
R20 "100K" 0201_CC 1271.89,1639.9 r180 top
R21 "100K" 0201_CC 1271.55,1596.05 r180 top
R23 "10K" 0201_CC 1218,1382 r180 bottom
R26 "510K" 0402_CC 1327.28,1466.58 r270 top
R28 "8.2K" 0402_CC 1092,1629 r0 bottom
R29 "200" 0201_CC 1089,1662 r0 bottom
R30 "200" 0201_CC 1087.89,1598.3 r0 bottom
R37 "10K" 0402_CC 1900,1410 r90 bottom
R47 "10K" 0402_CC 1412.46,1348.56 r270 bottom
R48 "0" 0402_CC 685,735 r270 top
R51 "0" 0402_CC 695,630 r180 top
R52 "0" 0402_CC 695,675 r180 top
R54 "0" 0402_CC 640,735 r270 top
R55 "0" RC0402_25 715,165 r90 top
R57 "1M" 0201_CC 145,350 r270 top
R71 "10K" 0402_CC 1559.89,124.9 r270 bottom
R72 "10K" 0402_CC 1519.89,124.9 r270 bottom
R75 "10K" 0402_CC 1479.89,124.9 r270 bottom
R76 "10K" 0402_CC 1439.89,124.9 r270 bottom
R79 "10K" 0402_CC 1467.33,1318.97 r90 bottom
R95 "10K" 0402_CC 1609.66,452.9 r90 bottom
R97 "10K" 0402_CC 1574.66,452.9 r90 bottom
R100 "0" RC0402_25 1498.9,1602.17 r180 top
R102 "100K" 0201_CC 1584.74,1730.27 r270 top
R103 "100K" 0201_CC 1185.53,1254.9 r90 bottom
R106 "100K" 0201_CC 675,170 r90 top
R108 "30K" 0201_CC 1089.89,1369.9 r90 bottom
R109 "30K" 0201_CC 1141.89,1314.9 r0 bottom
R111 "0" 0402_CC 90,560 r180 top
R113 "0" RC0402_25 1339.01,1652.57 r0 top
R114 "0" 0402_CC 90,460 r180 top
R116 "0" RC0402_25 1182,334 r180 top
R117 "10K" 0201_CC 1507.49,1233 r180 top
R118 "10K" 0201_CC 1490,1114 r90 top
R119 "10K" 0201_CC 1199.49,1030.6 r270 bottom
R120 "10K" 0201_CC 1171.49,1031 r270 bottom
R121 "10K" 0201_CC 713.39,1308.8 r0 bottom
R122 "10K" 0201_CC 763.39,1309.3 r180 bottom
R123 "10K" 0201_CC 715.49,991.3 r0 bottom
R124 "10K" 0201_CC 779.59,993.6 r180 bottom
R125 "1K" 0201_CC 1689.83,1755.76 r90 top
R127 "0" RC0402_25 90,505 r0 top
R133 "4.7K" 0201_CC 1277.5,1030.6 r270 bottom
R134 "0" RC0402_25 1186,1879 r90 top
R135 "100K" 0201_CC 1224,1879 r90 top
R140 "0" 0402_CC 575,610 r270 bottom
R141 "0" 0402_CC 620,610 r90 bottom
R142 "0" 0402_CC 569,528.24 r270 bottom
R143 "0" 0402_CC 534,528.76 r90 bottom
R144 "0" 0402_CC 540,320 r90 bottom
R145 "0" 0402_CC 505,320 r270 bottom
R146 "0" 0402_CC 175,255 r90 top
U1 "MIMX8MM6DVTLZAA" bga486_0p5_14x14 924.89,1149.9 r0 top
U2 "MT53E512M32D2NP-046 WT:F" bga200_0p65x0p8_10p1x14p6 243.33,1149.9 r180 top
U4 "SDINBDG4-32G-I1" fbga153_0p5_11p5x13 1791.18,1305.26 r0 top
U5 "MT25QU256ABA1EW7-0SIT" dfn8_1p27_6x5mm_3p1 1865,1600 r90 bottom
U8 "PCA9450AAHN" hvqfn56_0p4_7x7_ep4p7mm 398.69,431.23 r0 top
U10 "LD39015M12R" sot23-5 975,1605 r0 bottom
UL_BOX "" UL_BOX 1990,1745 r0 top
Y1 "24MHZ" xtlosc4_3p2x2p5mm_sm 1414.35,1472.82 r90 top

## Footprints (in the part's own frame and the unit in brackets; to place one, negate y for a bottom-side part, rotate by r counter-clockwise, add the part's x,y. Pads: shape width x height; smd on the part's side, far side on the other; paste and mask are expansions set on the pad)
0201_CC [mil] "0201_CC"
  rect 12x12 smd: 1(-10.51,0) 2(10.51,0)
  L1_PS keep-out region: -2.64,7.87 -2.64,-7.87 2.64,-7.87 2.64,7.87
  L1_PS keep-out region: -2.64,7.87 -2.64,-7.87 2.64,-7.87 2.64,7.87
  body extent -12,-6 12,6, height 13
0402_CC [mil] "0402_CC"
  rect 18x20 smd: 1(-14.76,0) 2(14.76,0)
  L1_PS keep-out region: -5.75,10 -5.75,-10 5.75,-10 5.75,10
  L1_PS keep-out region: -5.75,10 -5.75,-10 5.75,-10 5.75,10
  silkscreen extent -21,-18 21,18, body extent -20,-10 20,10, height 16
0402_cc_nsp [mil] "0402_CC_NSP"
  rect 18x20 smd: 1(-14.76,0) 2(14.76,0)
  L1_PS keep-out region: -5.75,10 -5.75,-10 5.75,-10 5.75,10
  L1_PS keep-out region: -5.75,10 -5.75,-10 5.75,-10 5.75,10
  silkscreen extent -21,-18 21,18, body extent -20,-10 20,10, height 16
bga200_0p65x0p8_10p1x14p6 [mil] "BGA200_0P65X0P8_10P1X14P6"
  round 11.5 smd: A1(-173.23,268.7) A2(-141.73,268.7) A3(-110.24,268.7) A4(-78.74,268.7) A5(-47.24,268.7) A8(47.24,268.7) A9(78.74,268.7) A10(110.24,268.7) A11(141.73,268.7) A12(173.23,268.7) AA1(-173.23,-243.11) AA2(-141.73,-243.11) AA3(-110.24,-243.11) AA4(-78.74,-243.11) AA5(-47.24,-243.11) AA8(47.24,-243.11) AA9(78.74,-243.11) AA10(110.24,-243.11) AA11(141.73,-243.11) AA12(173.23,-243.11) AB1(-173.23,-268.7) AB2(-141.73,-268.7) AB3(-110.24,-268.7) AB4(-78.74,-268.7) AB5(-47.24,-268.7) AB8(47.24,-268.7) AB9(78.74,-268.7) AB10(110.24,-268.7) AB11(141.73,-268.7) AB12(173.23,-268.7) B1(-173.23,243.11) B2(-141.73,243.11) B3(-110.24,243.11) B4(-78.74,243.11) B5(-47.24,243.11) B8(47.24,243.11) B9(78.74,243.11) B10(110.24,243.11) B11(141.73,243.11) B12(173.23,243.11) C1(-173.23,217.52) C2(-141.73,217.52) C3(-110.24,217.52) C4(-78.74,217.52) C5(-47.24,217.52) C8(47.24,217.52) C9(78.74,217.52) C10(110.24,217.52) C11(141.73,217.52) C12(173.23,217.52) D1(-173.23,191.93) D2(-141.73,191.93) D3(-110.24,191.93) D4(-78.74,191.93) D5(-47.24,191.93) D8(47.24,191.93) D9(78.74,191.93) D10(110.24,191.93) D11(141.73,191.93) D12(173.23,191.93) E1(-173.23,166.34) E2(-141.73,166.34) E3(-110.24,166.34) E4(-78.74,166.34) E5(-47.24,166.34) E8(47.24,166.34) E9(78.74,166.34) E10(110.24,166.34) E11(141.73,166.34) E12(173.23,166.34) F1(-173.23,140.75) F2(-141.73,140.75) F3(-110.24,140.75) F4(-78.74,140.75) F5(-47.24,140.75) F8(47.24,140.75) F9(78.74,140.75) F10(110.24,140.75) F11(141.73,140.75) F12(173.23,140.75) G1(-173.23,115.16) G2(-141.73,115.16) G3(-110.24,115.16) G4(-78.74,115.16) G5(-47.24,115.16) G8(47.24,115.16) G9(78.74,115.16) G10(110.24,115.16) G11(141.73,115.16) G12(173.23,115.16) H1(-173.23,89.57) H2(-141.73,89.57) H3(-110.24,89.57) H4(-78.74,89.57) H5(-47.24,89.57) H8(47.24,89.57) H9(78.74,89.57) H10(110.24,89.57) H11(141.73,89.57) H12(173.23,89.57) J1(-173.23,63.98) J2(-141.73,63.98) J3(-110.24,63.98) J4(-78.74,63.98) J5(-47.24,63.98) J8(47.24,63.98) J9(78.74,63.98) J10(110.24,63.98) J11(141.73,63.98) J12(173.23,63.98) K1(-173.23,38.39) K2(-141.73,38.39) K3(-110.24,38.39) K4(-78.74,38.39) K5(-47.24,38.39) K8(47.24,38.39) K9(78.74,38.39) K10(110.24,38.39) K11(141.73,38.39) K12(173.23,38.39) N1(-173.23,-38.39) N2(-141.73,-38.39) N3(-110.24,-38.39) N4(-78.74,-38.39) N5(-47.24,-38.39) N8(47.24,-38.39) N9(78.74,-38.39) N10(110.24,-38.39) N11(141.73,-38.39) N12(173.23,-38.39) P1(-173.23,-63.98) P2(-141.73,-63.98) P3(-110.24,-63.98) P4(-78.74,-63.98) P5(-47.24,-63.98) P8(47.24,-63.98) P9(78.74,-63.98) P10(110.24,-63.98) P11(141.73,-63.98) P12(173.23,-63.98) R1(-173.23,-89.57) R2(-141.73,-89.57) R3(-110.24,-89.57) R4(-78.74,-89.57) R5(-47.24,-89.57) R8(47.24,-89.57) R9(78.74,-89.57) R10(110.24,-89.57) R11(141.73,-89.57) R12(173.23,-89.57) T1(-173.23,-115.16) T2(-141.73,-115.16) T3(-110.24,-115.16) T4(-78.74,-115.16) T5(-47.24,-115.16) T8(47.24,-115.16) T9(78.74,-115.16) T10(110.24,-115.16) T11(141.73,-115.16) T12(173.23,-115.16) U1(-173.23,-140.75) U2(-141.73,-140.75) U3(-110.24,-140.75) U4(-78.74,-140.75) U5(-47.24,-140.75) U8(47.24,-140.75) U9(78.74,-140.75) U10(110.24,-140.75) U11(141.73,-140.75) U12(173.23,-140.75) V1(-173.23,-166.34) V2(-141.73,-166.34) V3(-110.24,-166.34) V4(-78.74,-166.34) V5(-47.24,-166.34) V8(47.24,-166.34) V9(78.74,-166.34) V10(110.24,-166.34) V11(141.73,-166.34) V12(173.23,-166.34) W1(-173.23,-191.93) W2(-141.73,-191.93) W3(-110.24,-191.93) W4(-78.74,-191.93) W5(-47.24,-191.93) W8(47.24,-191.93) W9(78.74,-191.93) W10(110.24,-191.93) W11(141.73,-191.93) W12(173.23,-191.93) Y1(-173.23,-217.52) Y2(-141.73,-217.52) Y3(-110.24,-217.52) Y4(-78.74,-217.52) Y5(-47.24,-217.52) Y8(47.24,-217.52) Y9(78.74,-217.52) Y10(110.24,-217.52) Y11(141.73,-217.52) Y12(173.23,-217.52)
  silkscreen extent -244,-294 206,331, body extent -197,-295 197,295, height 39
bga486_0p5_14x14 [mil] "BGA486_0P5_14X14"
  round 10 smd: A1(-255.91,255.91) A2(-236.22,255.91) A3(-216.54,255.91) A4(-196.85,255.91) A5(-177.16,255.91) A6(-157.48,255.91) A7(-137.8,255.91) A8(-118.11,255.91) A9(-98.42,255.91) A10(-78.74,255.91) A11(-59.06,255.91) A12(-39.37,255.91) A13(-19.68,255.91) A14(0,255.91) A15(19.68,255.91) A16(39.37,255.91) A17(59.06,255.91) A18(78.74,255.91) A19(98.42,255.91) A20(118.11,255.91) A21(137.8,255.91) A22(157.48,255.91) A23(177.16,255.91) A24(196.85,255.91) A25(216.54,255.91) A26(236.22,255.91) A27(255.91,255.91) AA1(-255.91,-137.8) AA2(-236.22,-137.8) AA7(-137.8,-137.8) AA9(-98.42,-137.8) AA10(-78.74,-137.8) AA13(-19.68,-137.8) AA14(0,-137.8) AA15(19.68,-137.8) AA18(78.74,-137.8) AA19(98.42,-137.8) AA21(137.8,-137.8) AA26(236.22,-137.8) AA27(255.91,-137.8) AB1(-255.91,-157.48) AB2(-236.22,-157.48) AB3(-216.54,-157.48) AB4(-196.85,-157.48) AB5(-177.16,-157.48) AB6(-157.48,-157.48) AB9(-98.42,-157.48) AB10(-78.74,-157.48) AB13(-19.68,-157.48) AB15(19.68,-157.48) AB18(78.74,-157.48) AB19(98.42,-157.48) AB22(157.48,-157.48) AB23(177.16,-157.48) AB24(196.85,-157.48) AB25(216.54,-157.48) AB26(236.22,-157.48) AB27(255.91,-157.48) AC1(-255.91,-177.16) AC2(-236.22,-177.16) AC3(-216.54,-177.16) AC4(-196.85,-177.16) AC6(-157.48,-177.16) AC9(-98.42,-177.16) AC10(-78.74,-177.16) AC13(-19.68,-177.16) AC14(0,-177.16) AC15(19.68,-177.16) AC18(78.74,-177.16) AC19(98.42,-177.16) AC22(157.48,-177.16) AC24(196.85,-177.16) AC25(216.54,-177.16) AC26(236.22,-177.16) AC27(255.91,-177.16) AD1(-255.91,-196.85) AD2(-236.22,-196.85) AD5(-177.16,-196.85) AD6(-157.48,-196.85) AD9(-98.42,-196.85) AD10(-78.74,-196.85) AD13(-19.68,-196.85) AD15(19.68,-196.85) AD18(78.74,-196.85) AD19(98.42,-196.85) AD22(157.48,-196.85) AD23(177.16,-196.85) AD26(236.22,-196.85) AD27(255.91,-196.85) AE1(-255.91,-216.54) AE2(-236.22,-216.54) AE5(-177.16,-216.54) AE6(-157.48,-216.54) AE9(-98.42,-216.54) AE10(-78.74,-216.54) AE13(-19.68,-216.54) AE14(0,-216.54) AE15(19.68,-216.54) AE18(78.74,-216.54) AE19(98.42,-216.54) AE22(157.48,-216.54) AE23(177.16,-216.54) AE26(236.22,-216.54) AE27(255.91,-216.54) AF1(-255.91,-236.22) AF2(-236.22,-236.22) AF3(-216.54,-236.22) AF4(-196.85,-236.22) AF5(-177.16,-236.22) AF6(-157.48,-236.22) AF7(-137.8,-236.22) AF8(-118.11,-236.22) AF9(-98.42,-236.22) AF10(-78.74,-236.22) AF11(-59.06,-236.22) AF12(-39.37,-236.22) AF13(-19.68,-236.22) AF14(0,-236.22) AF15(19.68,-236.22) AF16(39.37,-236.22) AF17(59.06,-236.22) AF18(78.74,-236.22) AF19(98.42,-236.22) AF20(118.11,-236.22) AF21(137.8,-236.22) AF22(157.48,-236.22) AF23(177.16,-236.22) AF24(196.85,-236.22) AF25(216.54,-236.22) AF26(236.22,-236.22) AF27(255.91,-236.22) AG1(-255.91,-255.91) AG2(-236.22,-255.91) AG3(-216.54,-255.91) AG4(-196.85,-255.91) AG5(-177.16,-255.91) AG6(-157.48,-255.91) AG7(-137.8,-255.91) AG8(-118.11,-255.91) AG9(-98.42,-255.91) AG10(-78.74,-255.91) AG11(-59.06,-255.91) AG12(-39.37,-255.91) AG13(-19.68,-255.91) AG14(0,-255.91) AG15(19.68,-255.91) AG16(39.37,-255.91) AG17(59.06,-255.91) AG18(78.74,-255.91) AG19(98.42,-255.91) AG20(118.11,-255.91) AG21(137.8,-255.91) AG22(157.48,-255.91) AG23(177.16,-255.91) AG24(196.85,-255.91) AG25(216.54,-255.91) AG26(236.22,-255.91) AG27(255.91,-255.91) B1(-255.91,236.22) B2(-236.22,236.22) B3(-216.54,236.22) B4(-196.85,236.22) B5(-177.16,236.22) B6(-157.48,236.22) B7(-137.8,236.22) B8(-118.11,236.22) B9(-98.42,236.22) B10(-78.74,236.22) B11(-59.06,236.22) B12(-39.37,236.22) B13(-19.68,236.22) B14(0,236.22) B15(19.68,236.22) B16(39.37,236.22) B17(59.06,236.22) B18(78.74,236.22) B19(98.42,236.22) B20(118.11,236.22) B21(137.8,236.22) B22(157.48,236.22) B23(177.16,236.22) B24(196.85,236.22) B25(216.54,236.22) B26(236.22,236.22) B27(255.91,236.22) C1(-255.91,216.54) C2(-236.22,216.54) C5(-177.16,216.54) C6(-157.48,216.54) C9(-98.42,216.54) C10(-78.74,216.54) C13(-19.68,216.54) C14(0,216.54) C15(19.68,216.54) C18(78.74,216.54) C19(98.42,216.54) C22(157.48,216.54) C23(177.16,216.54) C26(236.22,216.54) C27(255.91,216.54) D1(-255.91,196.85) D2(-236.22,196.85) D5(-177.16,196.85) D6(-157.48,196.85) D9(-98.42,196.85) D10(-78.74,196.85) D13(-19.68,196.85) D15(19.68,196.85) D18(78.74,196.85) D19(98.42,196.85) D22(157.48,196.85) D23(177.16,196.85) D26(236.22,196.85) D27(255.91,196.85) E1(-255.91,177.16) E2(-236.22,177.16) E3(-216.54,177.16) E4(-196.85,177.16) E6(-157.48,177.16) E9(-98.42,177.16) E10(-78.74,177.16) E13(-19.68,177.16) E14(0,177.16) E15(19.68,177.16) E18(78.74,177.16) E19(98.42,177.16) E22(157.48,177.16) E24(196.85,177.16) E25(216.54,177.16) E26(236.22,177.16) E27(255.91,177.16) F1(-255.91,157.48) F2(-236.22,157.48) F3(-216.54,157.48) F4(-196.85,157.48) F5(-177.16,157.48) F6(-157.48,157.48) F9(-98.42,157.48) F10(-78.74,157.48) F13(-19.68,157.48) F15(19.68,157.48) F18(78.74,157.48) F19(98.42,157.48) F22(157.48,157.48) F23(177.16,157.48) F24(196.85,157.48) F25(216.54,157.48) F26(236.22,157.48) F27(255.91,157.48) G1(-255.91,137.8) G2(-236.22,137.8) G7(-137.8,137.8) G9(-98.42,137.8) G10(-78.74,137.8) G13(-19.68,137.8) G14(0,137.8) G15(19.68,137.8) G18(78.74,137.8) G19(98.42,137.8) G21(137.8,137.8) G26(236.22,137.8) G27(255.91,137.8) H1(-255.91,118.11) H2(-236.22,118.11) H10(-78.74,118.11) H13(-19.68,118.11) H15(19.68,118.11) H18(78.74,118.11) H26(236.22,118.11) H27(255.91,118.11) J1(-255.91,98.42) J2(-236.22,98.42) J3(-216.54,98.42) J4(-196.85,98.42) J5(-177.16,98.42) J6(-157.48,98.42) J7(-137.8,98.42) J10(-78.74,98.42) J11(-59.06,98.42) J12(-39.37,98.42) J13(-19.68,98.42) J14(0,98.42) J15(19.68,98.42) J16(39.37,98.42) J17(59.06,98.42) J18(78.74,98.42) J21(137.8,98.42) J22(157.48,98.42) J23(177.16,98.42) J24(196.85,98.42) J25(216.54,98.42) J26(236.22,98.42) J27(255.91,98.42) K1(-255.91,78.74) K2(-236.22,78.74) K3(-216.54,78.74) K4(-196.85,78.74) K5(-177.16,78.74) K6(-157.48,78.74) K7(-137.8,78.74) K8(-118.11,78.74) K9(-98.42,78.74) K12(-39.37,78.74) K13(-19.68,78.74) K15(19.68,78.74) K16(39.37,78.74) K19(98.42,78.74) K20(118.11,78.74) K21(137.8,78.74) K22(157.48,78.74) K23(177.16,78.74) K24(196.85,78.74) K25(216.54,78.74) K26(236.22,78.74) K27(255.91,78.74) L1(-255.91,59.06) L2(-236.22,59.06) L9(-98.42,59.06) L10(-78.74,59.06) L11(-59.06,59.06) L12(-39.37,59.06) L13(-19.68,59.06) L15(19.68,59.06) L16(39.37,59.06) L17(59.06,59.06) L18(78.74,59.06) L19(98.42,59.06) L26(236.22,59.06) L27(255.91,59.06) M1(-255.91,39.37) M2(-236.22,39.37) M9(-98.42,39.37) M12(-39.37,39.37) M13(-19.68,39.37) M14(0,39.37) M15(19.68,39.37) M16(39.37,39.37) M19(98.42,39.37) M26(236.22,39.37) M27(255.91,39.37) N1(-255.91,19.68) N2(-236.22,19.68) N3(-216.54,19.68) N4(-196.85,19.68) N5(-177.16,19.68) N6(-157.48,19.68) N7(-137.8,19.68) N8(-118.11,19.68) N9(-98.42,19.68) N10(-78.74,19.68) N11(-59.06,19.68) N12(-39.37,19.68) N13(-19.68,19.68) N15(19.68,19.68) N16(39.37,19.68) N17(59.06,19.68) N18(78.74,19.68) N19(98.42,19.68) N20(118.11,19.68) N21(137.8,19.68) N22(157.48,19.68) N23(177.16,19.68) N24(196.85,19.68) N25(216.54,19.68) N26(236.22,19.68) N27(255.91,19.68) P1(-255.91,0) P2(-236.22,0) P3(-216.54,0) P5(-177.16,0) P7(-137.8,0) P9(-98.42,0) P12(-39.37,0) P13(-19.68,0) P15(19.68,0) P16(39.37,0) P19(98.42,0) P21(137.8,0) P23(177.16,0) P25(216.54,0) P26(236.22,0) P27(255.91,0) R1(-255.91,-19.68) R2(-236.22,-19.68) R3(-216.54,-19.68) R4(-196.85,-19.68) R5(-177.16,-19.68) R6(-157.48,-19.68) R7(-137.8,-19.68) R8(-118.11,-19.68) R9(-98.42,-19.68) R10(-78.74,-19.68) R11(-59.06,-19.68) R12(-39.37,-19.68) R13(-19.68,-19.68) R15(19.68,-19.68) R16(39.37,-19.68) R17(59.06,-19.68) R18(78.74,-19.68) R19(98.42,-19.68) R20(118.11,-19.68) R21(137.8,-19.68) R22(157.48,-19.68) R23(177.16,-19.68) R24(196.85,-19.68) R25(216.54,-19.68) R26(236.22,-19.68) R27(255.91,-19.68) T1(-255.91,-39.37) T2(-236.22,-39.37) T9(-98.42,-39.37) T12(-39.37,-39.37) T13(-19.68,-39.37) T14(0,-39.37) T15(19.68,-39.37) T16(39.37,-39.37) T19(98.42,-39.37) T26(236.22,-39.37) T27(255.91,-39.37) U1(-255.91,-59.06) U2(-236.22,-59.06) U9(-98.42,-59.06) U10(-78.74,-59.06) U11(-59.06,-59.06) U12(-39.37,-59.06) U13(-19.68,-59.06) U15(19.68,-59.06) U16(39.37,-59.06) U17(59.06,-59.06) U18(78.74,-59.06) U19(98.42,-59.06) U26(236.22,-59.06) U27(255.91,-59.06) V1(-255.91,-78.74) V2(-236.22,-78.74) V3(-216.54,-78.74) V4(-196.85,-78.74) V5(-177.16,-78.74) V6(-157.48,-78.74) V7(-137.8,-78.74) V8(-118.11,-78.74) V9(-98.42,-78.74) V12(-39.37,-78.74) V13(-19.68,-78.74) V15(19.68,-78.74) V16(39.37,-78.74) V19(98.42,-78.74) V20(118.11,-78.74) V21(137.8,-78.74) V22(157.48,-78.74) V23(177.16,-78.74) V24(196.85,-78.74) V25(216.54,-78.74) V26(236.22,-78.74) V27(255.91,-78.74) W1(-255.91,-98.42) W2(-236.22,-98.42) W3(-216.54,-98.42) W4(-196.85,-98.42) W5(-177.16,-98.42) W6(-157.48,-98.42) W7(-137.8,-98.42) W10(-78.74,-98.42) W11(-59.06,-98.42) W12(-39.37,-98.42) W13(-19.68,-98.42) W14(0,-98.42) W15(19.68,-98.42) W16(39.37,-98.42) W17(59.06,-98.42) W18(78.74,-98.42) W21(137.8,-98.42) W22(157.48,-98.42) W23(177.16,-98.42) W24(196.85,-98.42) W25(216.54,-98.42) W26(236.22,-98.42) W27(255.91,-98.42) Y1(-255.91,-118.11) Y2(-236.22,-118.11) Y10(-78.74,-118.11) Y13(-19.68,-118.11) Y15(19.68,-118.11) Y18(78.74,-118.11) Y26(236.22,-118.11) Y27(255.91,-118.11)
  silkscreen extent -303,-276 276,303, body extent -276,-276 276,276, height 45
cc0402_tol0p15 [mil] "CC0402_TOL0P15"
  rect 18x24 smd: 1(-18.7,0) 2(18.7,0)
  L1_PS keep-out region: 5,4 5,-4 5,-6.07 2.07,-9 -2.07,-9 -5,-6.07 -5,-4 -5,-4 -5,4 -5,6.07 -2.07,9 2.07,9 5,6.07 5,4
  silkscreen extent -24,-21 24,21, body extent -20,-10 20,10, height 16
CC0603_OV [mil] "CC0603_OV"
  oval 35x45 smd: 1(-30,0) 2(30,0)
  L1_PS keep-out region: -10,20 10,20 10,-20 -10,-20
  silkscreen extent -5,-25 5,25, body extent -31,-16 31,16, height 22
con20_0p4_6p8x3p1_sm [mil] "CON20_0P4_6P8X3P1_SM"
  rect 8x28 smd: 1(-70.87,-60.63) 2(-70.87,60.63) 3(-55.12,-60.63) 4(-55.12,60.63) 5(-39.37,-60.63) 6(-39.37,60.63) 7(-23.62,-60.63) 8(-23.62,60.63) 9(-7.87,-60.63) 10(-7.87,60.63) 11(7.87,-60.63) 12(7.87,60.63) 13(23.62,-60.63) 14(23.62,60.63) 15(39.37,-60.63) 16(39.37,60.63) 17(55.12,-60.63) 18(55.12,60.63) 19(70.87,-60.63) 20(70.87,60.63)
  L1_PS keep-out region: 66.87,46.63 66.87,29.53 74.87,29.53 74.87,46.63
  L1_PS keep-out region: 66.87,-29.53 66.87,-46.63 74.87,-46.63 74.87,-29.53
  L1_PS keep-out region: 35.37,46.63 35.37,29.53 43.37,29.53 43.37,46.63
  L1_PS keep-out region: 51.12,46.63 51.12,29.53 59.12,29.53 59.12,46.63
  L1_PS keep-out region: 35.37,-29.53 35.37,-46.63 43.37,-46.63 43.37,-29.53
  L1_PS keep-out region: 51.12,-29.53 51.12,-46.63 59.12,-46.63 59.12,-29.53
  L1_PS keep-out region: 19.62,46.63 19.62,29.53 27.62,29.53 27.62,46.63
  L1_PS keep-out region: 19.62,-29.53 19.62,-46.63 27.62,-46.63 27.62,-29.53
  L1_PS keep-out region: 3.87,46.63 3.87,29.53 11.87,29.53 11.87,46.63
  L1_PS keep-out region: 3.87,-29.53 3.87,-46.63 11.87,-46.63 11.87,-29.53
  L1_PS keep-out region: -27.62,46.63 -27.62,29.53 -19.62,29.53 -19.62,46.63
  L1_PS keep-out region: -11.87,46.63 -11.87,29.53 -3.87,29.53 -3.87,46.63
  L1_PS keep-out region: -27.62,-29.53 -27.62,-46.63 -19.62,-46.63 -19.62,-29.53
  L1_PS keep-out region: -11.87,-29.53 -11.87,-46.63 -3.87,-46.63 -3.87,-29.53
  L1_PS keep-out region: -43.37,46.63 -43.37,29.53 -35.37,29.53 -35.37,46.63
  L1_PS keep-out region: -43.37,-29.53 -43.37,-46.63 -35.37,-46.63 -35.37,-29.53
  L1_PS keep-out region: -59.12,46.63 -59.12,29.53 -51.12,29.53 -51.12,46.63
  L1_PS keep-out region: -59.12,-29.53 -59.12,-46.63 -51.12,-46.63 -51.12,-29.53
  L1_PS keep-out region: -74.87,46.63 -74.87,29.53 -66.87,29.53 -66.87,46.63
  L1_PS keep-out region: -74.87,-29.53 -74.87,-46.63 -66.87,-46.63 -66.87,-29.53
  silkscreen extent -141,-69 141,69, body extent -130,-67 130,67, height 58
con24_0p4_7p6x3p08_sm [mil] "CON24_0P4_7P6X3P08_SM"
  rect 8x28 smd: 1(-86.61,-60.63) 2(-86.61,60.63) 3(-70.87,-60.63) 4(-70.87,60.63) 5(-55.12,-60.63) 6(-55.12,60.63) 7(-39.37,-60.63) 8(-39.37,60.63) 9(-23.62,-60.63) 10(-23.62,60.63) 11(-7.87,-60.63) 12(-7.87,60.63) 13(7.87,-60.63) 14(7.87,60.63) 15(23.62,-60.63) 16(23.62,60.63) 17(39.37,-60.63) 18(39.37,60.63) 19(55.12,-60.63) 20(55.12,60.63) 21(70.87,-60.63) 22(70.87,60.63) 23(86.61,-60.63) 24(86.61,60.63)
  L1_PS keep-out region: 66.87,-29.53 66.87,-46.63 74.87,-46.63 74.87,-29.53
  L1_PS keep-out region: 51.12,-29.53 51.12,-46.63 59.12,-46.63 59.12,-29.53
  L1_PS keep-out region: 35.37,-29.53 35.37,-46.63 43.37,-46.63 43.37,-29.53
  L1_PS keep-out region: 19.62,-29.53 19.62,-46.63 27.62,-46.63 27.62,-29.53
  L1_PS keep-out region: 3.87,-29.53 3.87,-46.63 11.87,-46.63 11.87,-29.53
  L1_PS keep-out region: -11.87,-29.53 -11.87,-46.63 -3.87,-46.63 -3.87,-29.53
  L1_PS keep-out region: -27.62,-29.53 -27.62,-46.63 -19.62,-46.63 -19.62,-29.53
  L1_PS keep-out region: -43.37,-29.53 -43.37,-46.63 -35.37,-46.63 -35.37,-29.53
  L1_PS keep-out region: -59.12,-29.53 -59.12,-46.63 -51.12,-46.63 -51.12,-29.53
  L1_PS keep-out region: -74.87,-29.53 -74.87,-46.63 -66.87,-46.63 -66.87,-29.53
  L1_PS keep-out region: -90.61,-29.53 -90.61,-46.63 -82.61,-46.63 -82.61,-29.53
  L1_PS keep-out region: 82.61,-29.53 82.61,-46.63 90.61,-46.63 90.61,-29.53
  L1_PS keep-out region: 82.61,46.63 82.61,29.53 90.61,29.53 90.61,46.63
  L1_PS keep-out region: 66.87,46.63 66.87,29.53 74.87,29.53 74.87,46.63
  L1_PS keep-out region: 51.12,46.63 51.12,29.53 59.12,29.53 59.12,46.63
  L1_PS keep-out region: 35.37,46.63 35.37,29.53 43.37,29.53 43.37,46.63
  L1_PS keep-out region: 19.62,46.63 19.62,29.53 27.62,29.53 27.62,46.63
  L1_PS keep-out region: 3.87,46.63 3.87,29.53 11.87,29.53 11.87,46.63
  L1_PS keep-out region: -11.87,46.63 -11.87,29.53 -3.87,29.53 -3.87,46.63
  L1_PS keep-out region: -27.62,46.63 -27.62,29.53 -19.62,29.53 -19.62,46.63
  L1_PS keep-out region: -43.37,46.63 -43.37,29.53 -35.37,29.53 -35.37,46.63
  L1_PS keep-out region: -59.12,46.63 -59.12,29.53 -51.12,29.53 -51.12,46.63
  L1_PS keep-out region: -74.87,46.63 -74.87,29.53 -66.87,29.53 -66.87,46.63
  L1_PS keep-out region: -90.61,46.63 -90.61,29.53 -82.61,29.53 -82.61,46.63
  silkscreen extent -157,-68 157,68, body extent -147,-67 144,67, height 58
con100_0p4_21p7x2p05_sm [mil] "CON100_0P4_21P7X2P05_SM"
  rect 8x27 smd: 1(385.83,-53.85) 2(385.83,53.85) 3(370.08,-53.85) 4(370.08,53.85) 5(354.33,-53.85) 6(354.33,53.85) 7(338.58,-53.85) 8(338.58,53.85) 9(322.83,-53.85) 10(322.83,53.85) 11(307.09,-53.85) 12(307.09,53.85) 13(291.34,-53.85) 14(291.34,53.85) 15(275.59,-53.85) 16(275.59,53.85) 17(259.84,-53.85) 18(259.84,53.85) 19(244.09,-53.85) 20(244.09,53.85) 21(228.35,-53.85) 22(228.35,53.85) 23(212.6,-53.85) 24(212.6,53.85) 25(196.85,-53.85) 26(196.85,53.85) 27(181.1,-53.85) 28(181.1,53.85) 29(165.35,-53.85) 30(165.35,53.85) 31(149.61,-53.85) 32(149.61,53.85) 33(133.86,-53.85) 34(133.86,53.85) 35(118.11,-53.85) 36(118.11,53.85) 37(102.36,-53.85) 38(102.36,53.85) 39(86.61,-53.85) 40(86.61,53.85) 41(70.87,-53.85) 42(70.87,53.85) 43(55.12,-53.85) 44(55.12,53.85) 45(39.37,-53.85) 46(39.37,53.85) 47(23.62,-53.85) 48(23.62,53.85) 49(7.87,-53.85) 50(7.87,53.85) 51(-7.87,-53.85) 52(-7.87,53.85) 53(-23.62,-53.85) 54(-23.62,53.85) 55(-39.37,-53.85) 56(-39.37,53.85) 57(-55.12,-53.85) 58(-55.12,53.85) 59(-70.87,-53.85) 60(-70.87,53.85) 61(-86.61,-53.85) 62(-86.61,53.85) 63(-102.36,-53.85) 64(-102.36,53.85) 65(-118.11,-53.85) 66(-118.11,53.85) 67(-133.86,-53.85) 68(-133.86,53.85) 69(-149.61,-53.85) 70(-149.61,53.85) 71(-165.35,-53.85) 72(-165.35,53.85) 73(-181.1,-53.85) 74(-181.1,53.85) 75(-196.85,-53.85) 76(-196.85,53.85) 77(-212.6,-53.85) 78(-212.6,53.85) 79(-228.35,-53.85) 80(-228.35,53.85) 81(-244.09,-53.85) 82(-244.09,53.85) 83(-259.84,-53.85) 84(-259.84,53.85) 85(-275.59,-53.85) 86(-275.59,53.85) 87(-291.34,-53.85) 88(-291.34,53.85) 89(-307.09,-53.85) 90(-307.09,53.85) 91(-322.83,-53.85) 92(-322.83,53.85) 93(-338.58,-53.85) 94(-338.58,53.85) 95(-354.33,-53.85) 96(-354.33,53.85) 97(-370.08,-53.85) 98(-370.08,53.85) 99(-385.83,-53.85) 100(-385.83,53.85)
  rect 14x27 smd: ""(-404.53,-53.85) ""(-404.53,53.85) ""(404.53,-53.85) ""(404.53,53.85)
  silkscreen extent -435,-47 435,47, body extent -424,-58 424,58, height 45